# Altium PCB Smart-Switch-v1.1.PcbDoc (part 1 of 3)
Units mil, origin at the board's own origin, x right, y up, seen from the top; angles counter-clockwise.
Board outline 1456.69 x 1377.95 mil, 4 copper layers (Top Layer, Power Layer, Ground Layer, Bottom Layer), stack 39.334 mil thick; 77 components, 44 nets, 240 pads, 216 vias.
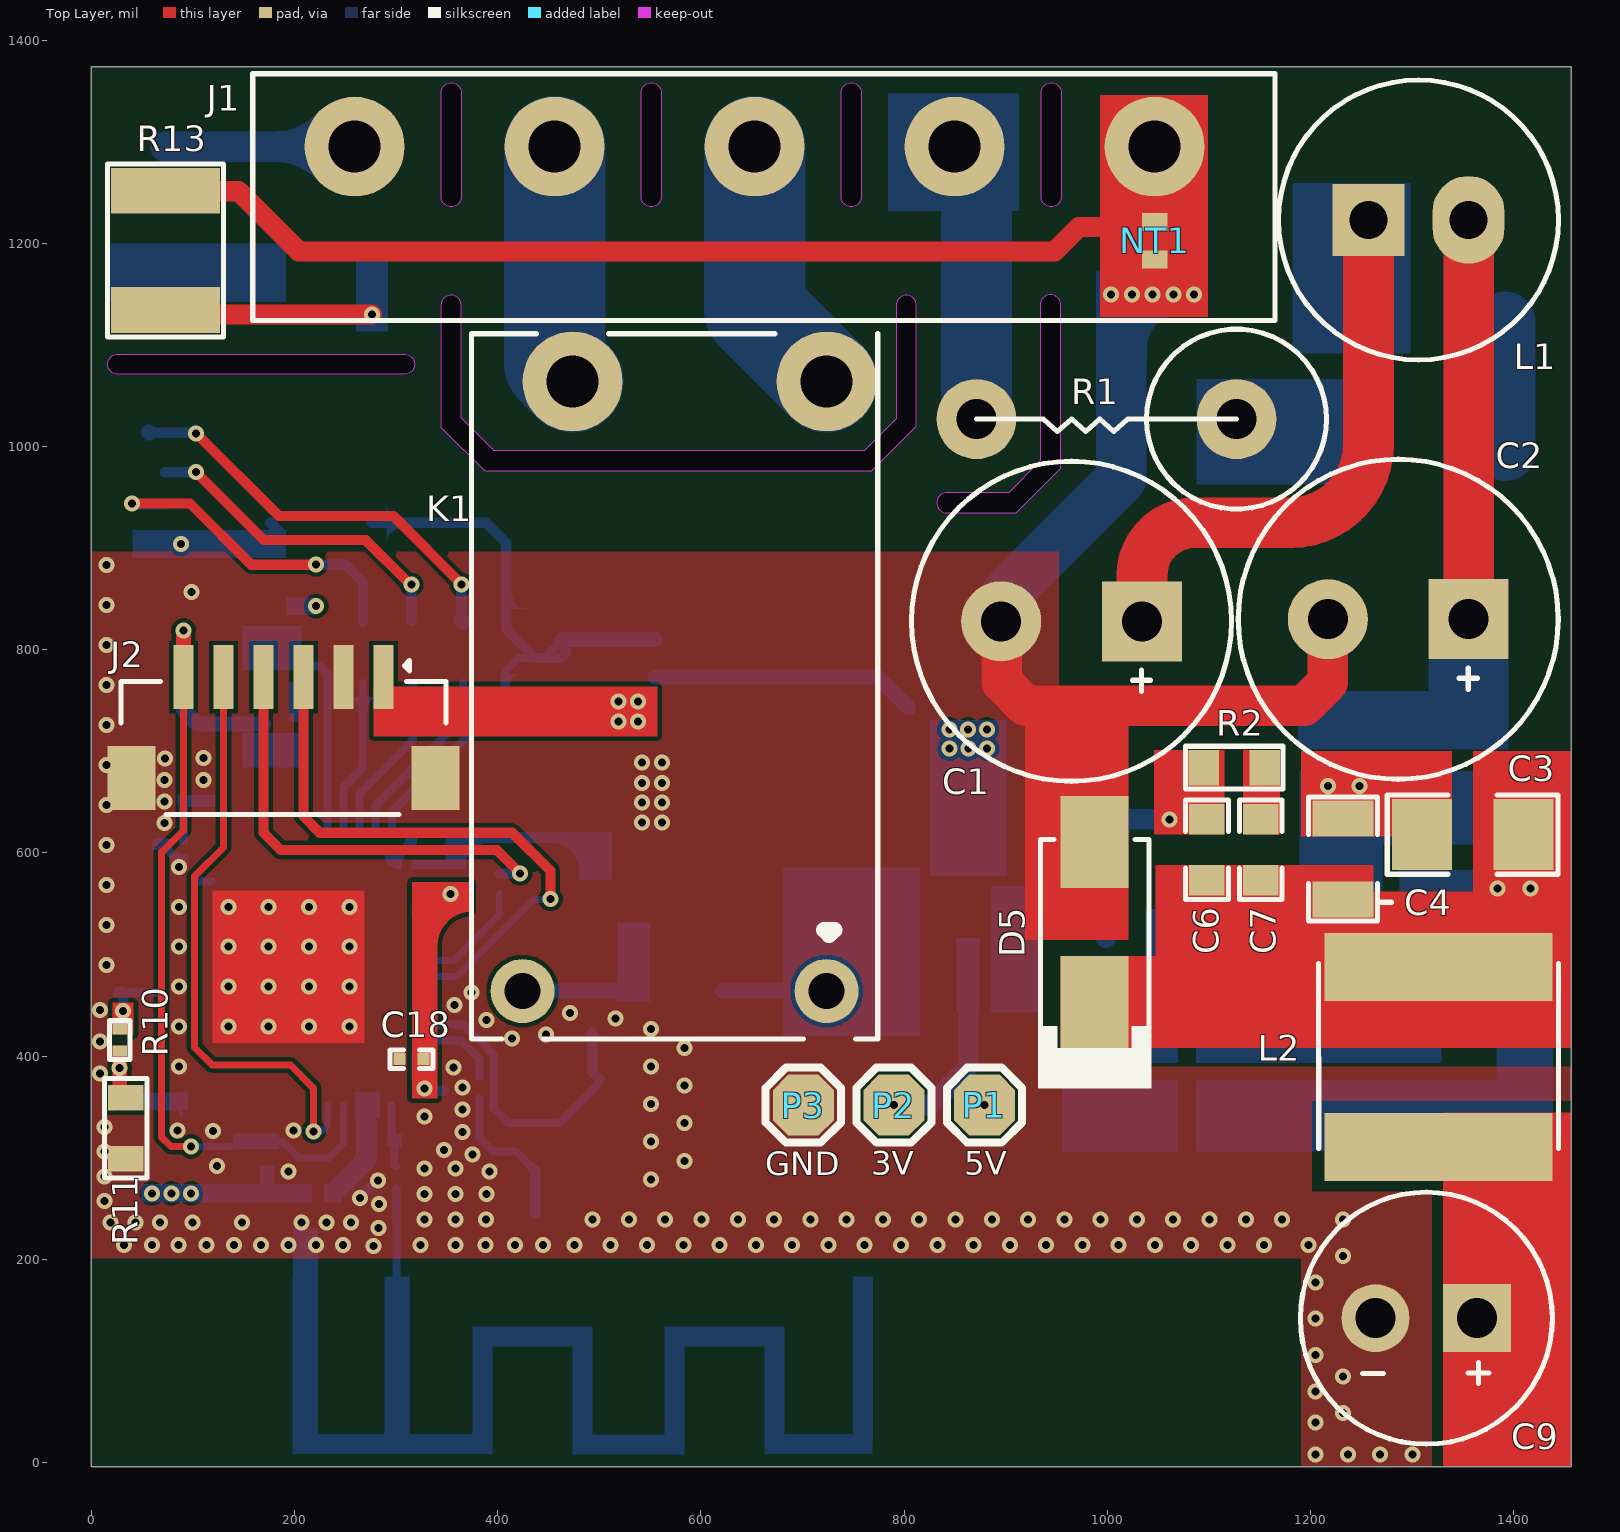
[diagram p0: Top Layer view]
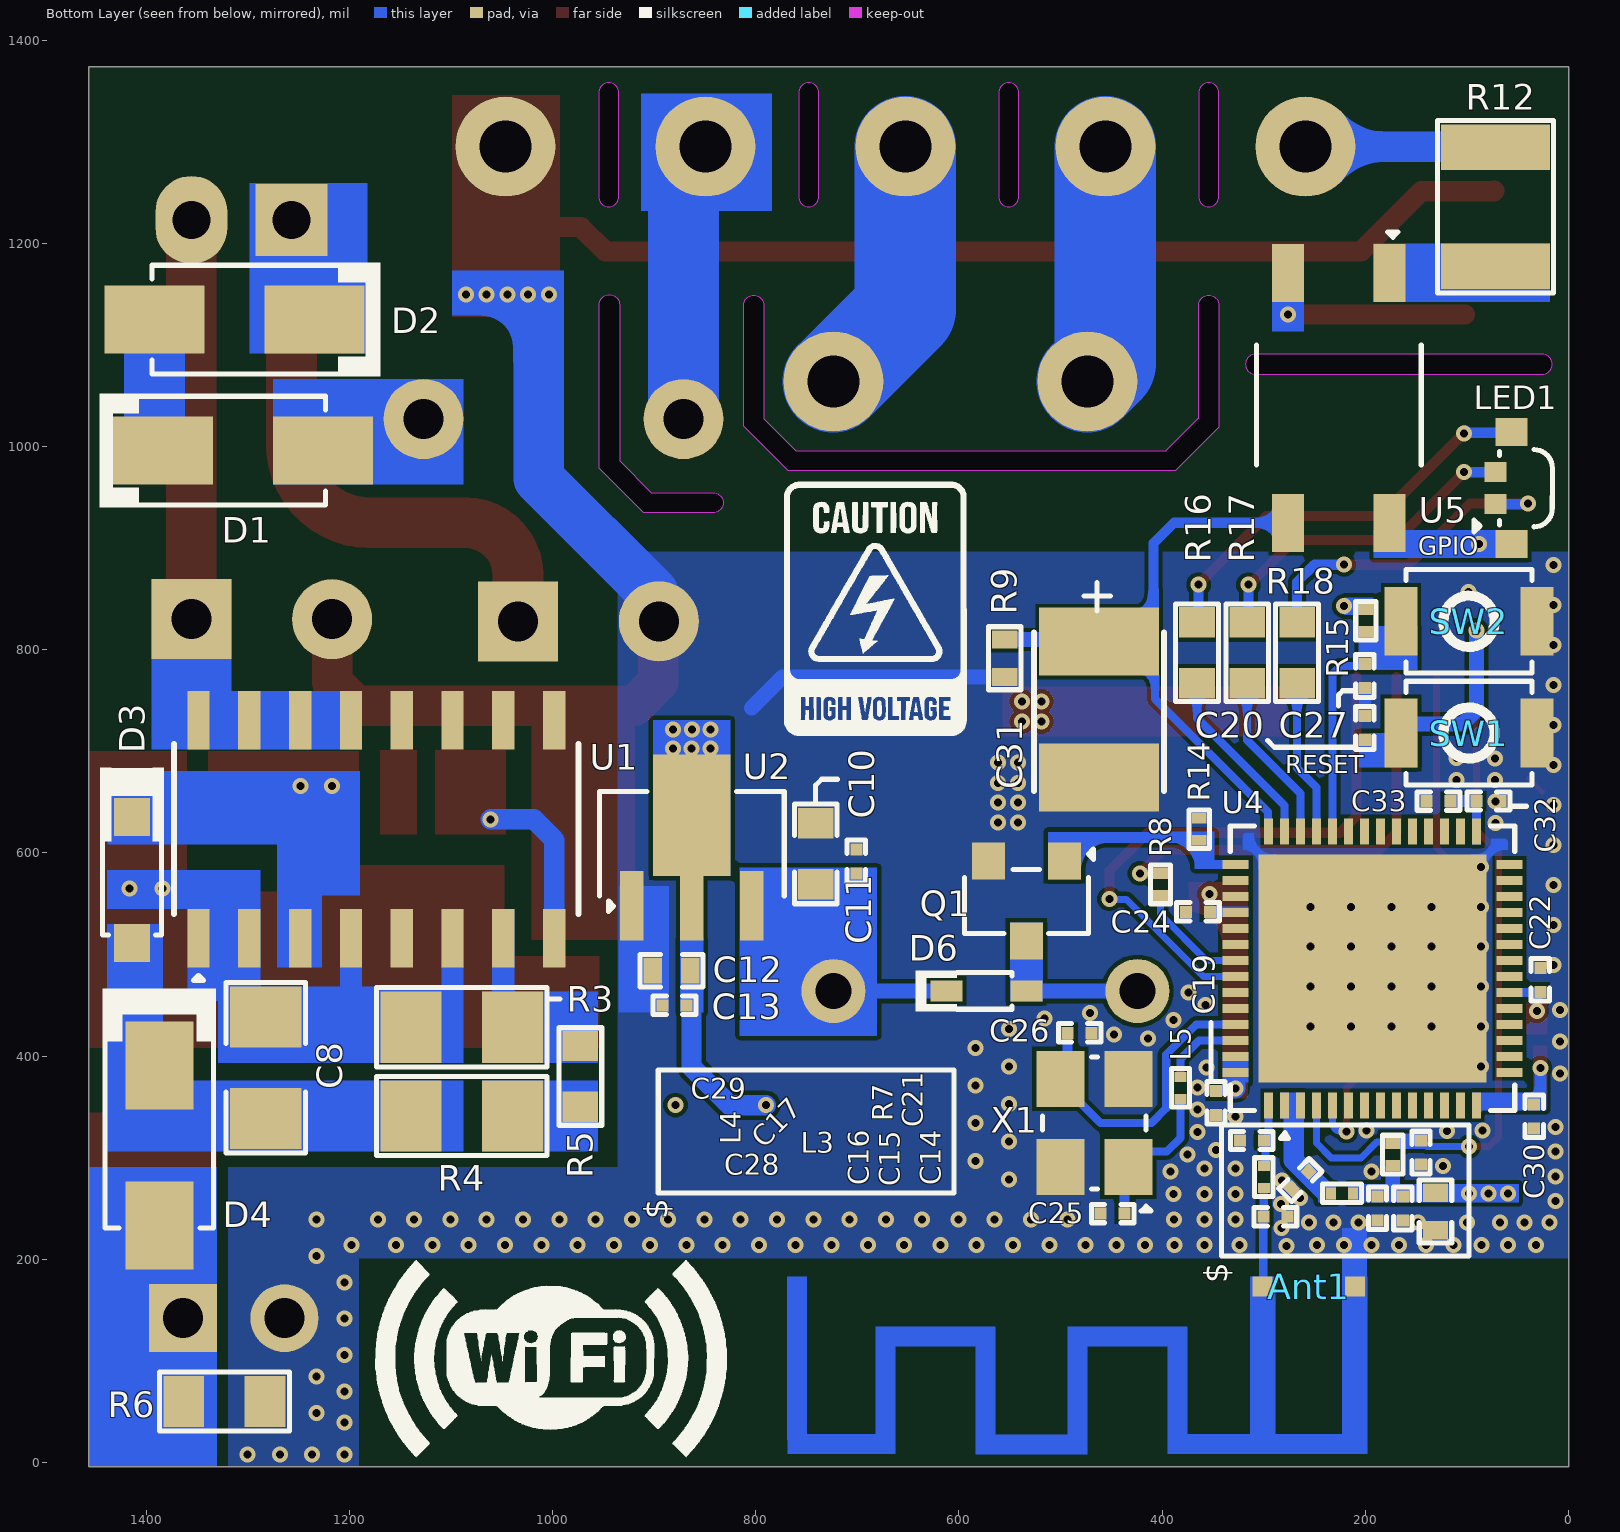
[diagram p1: Bottom Layer view, seen from below]
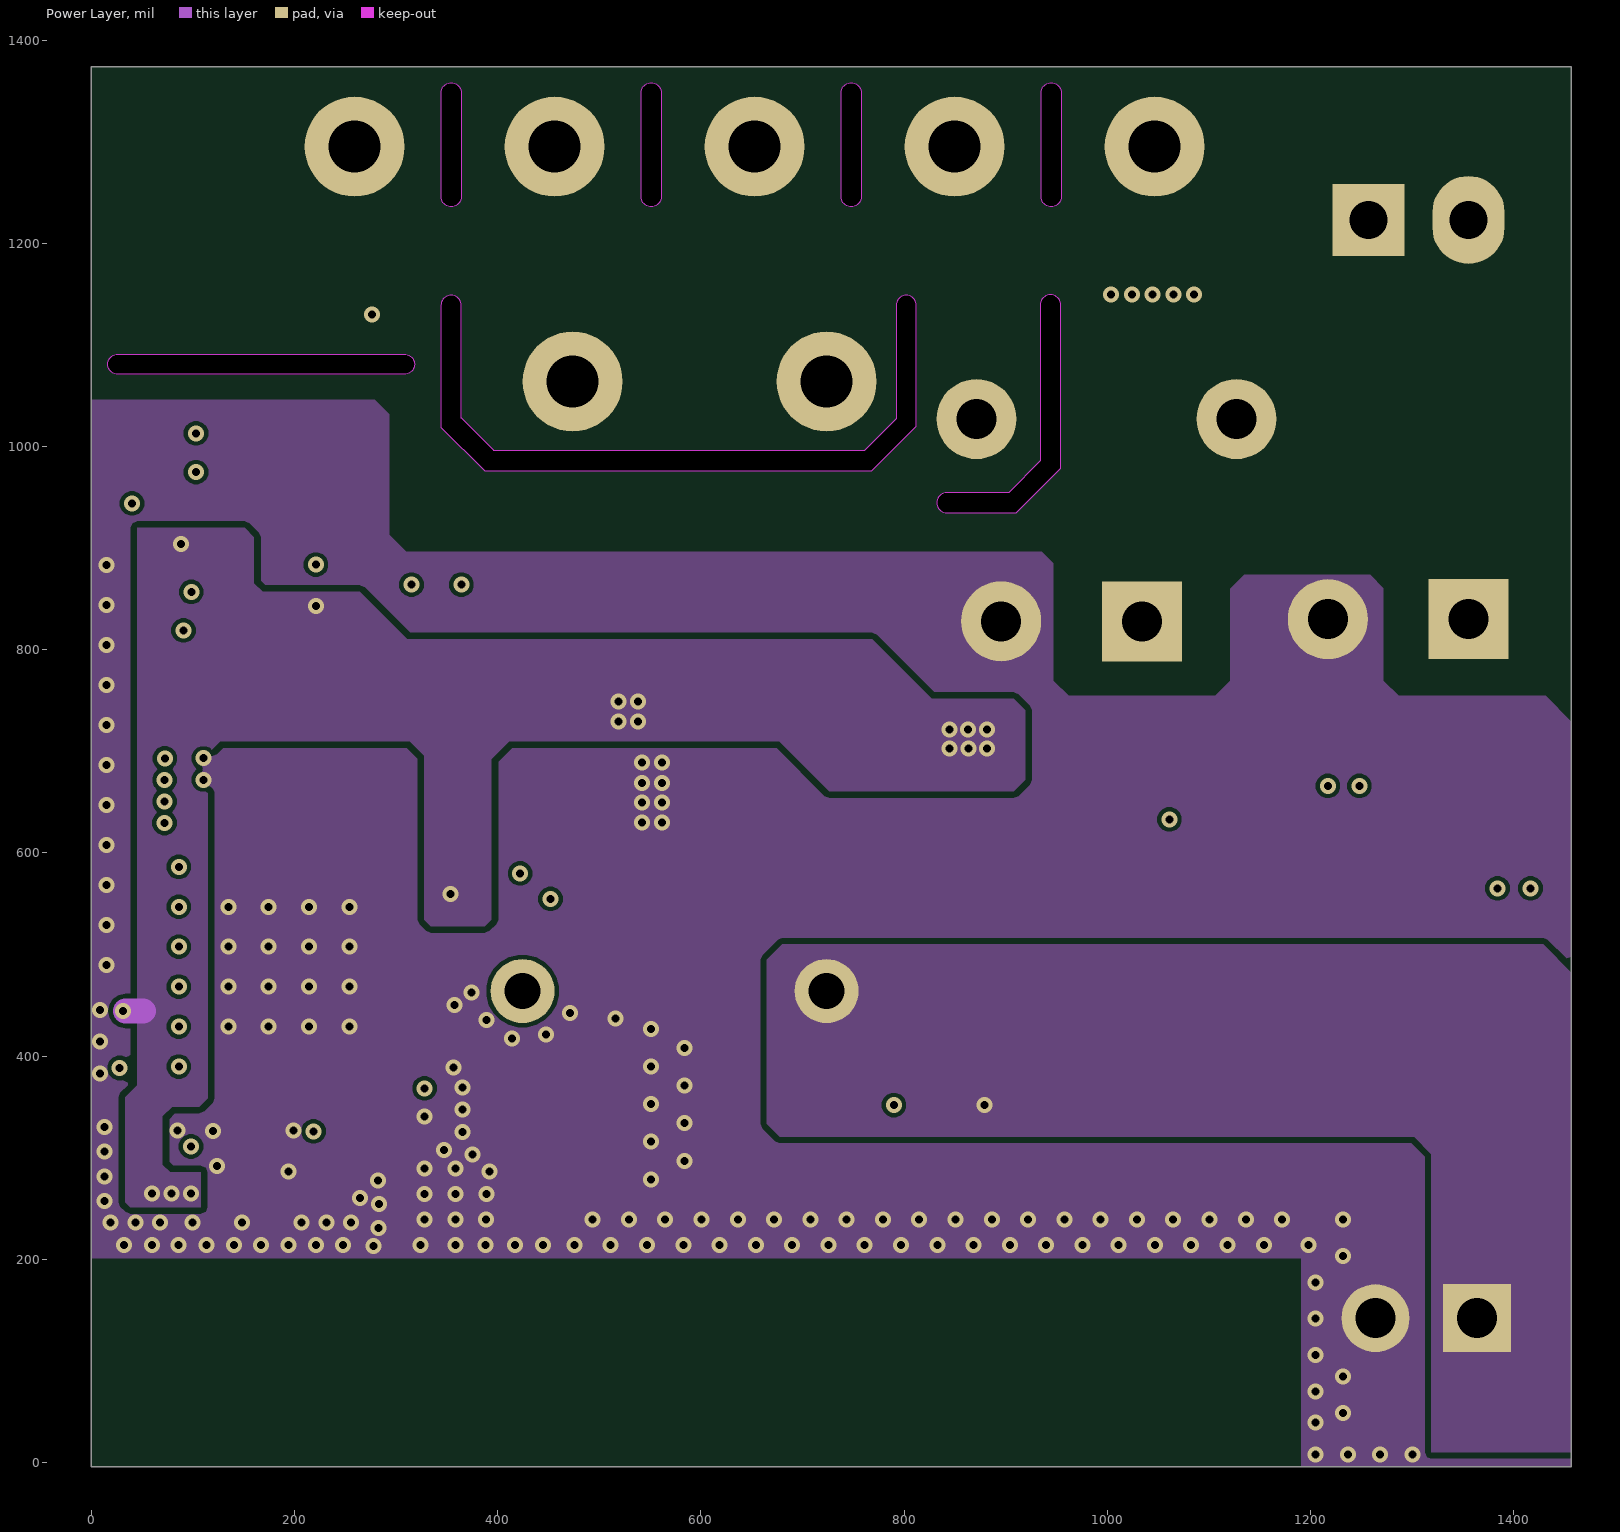
[diagram p2: Power Layer]
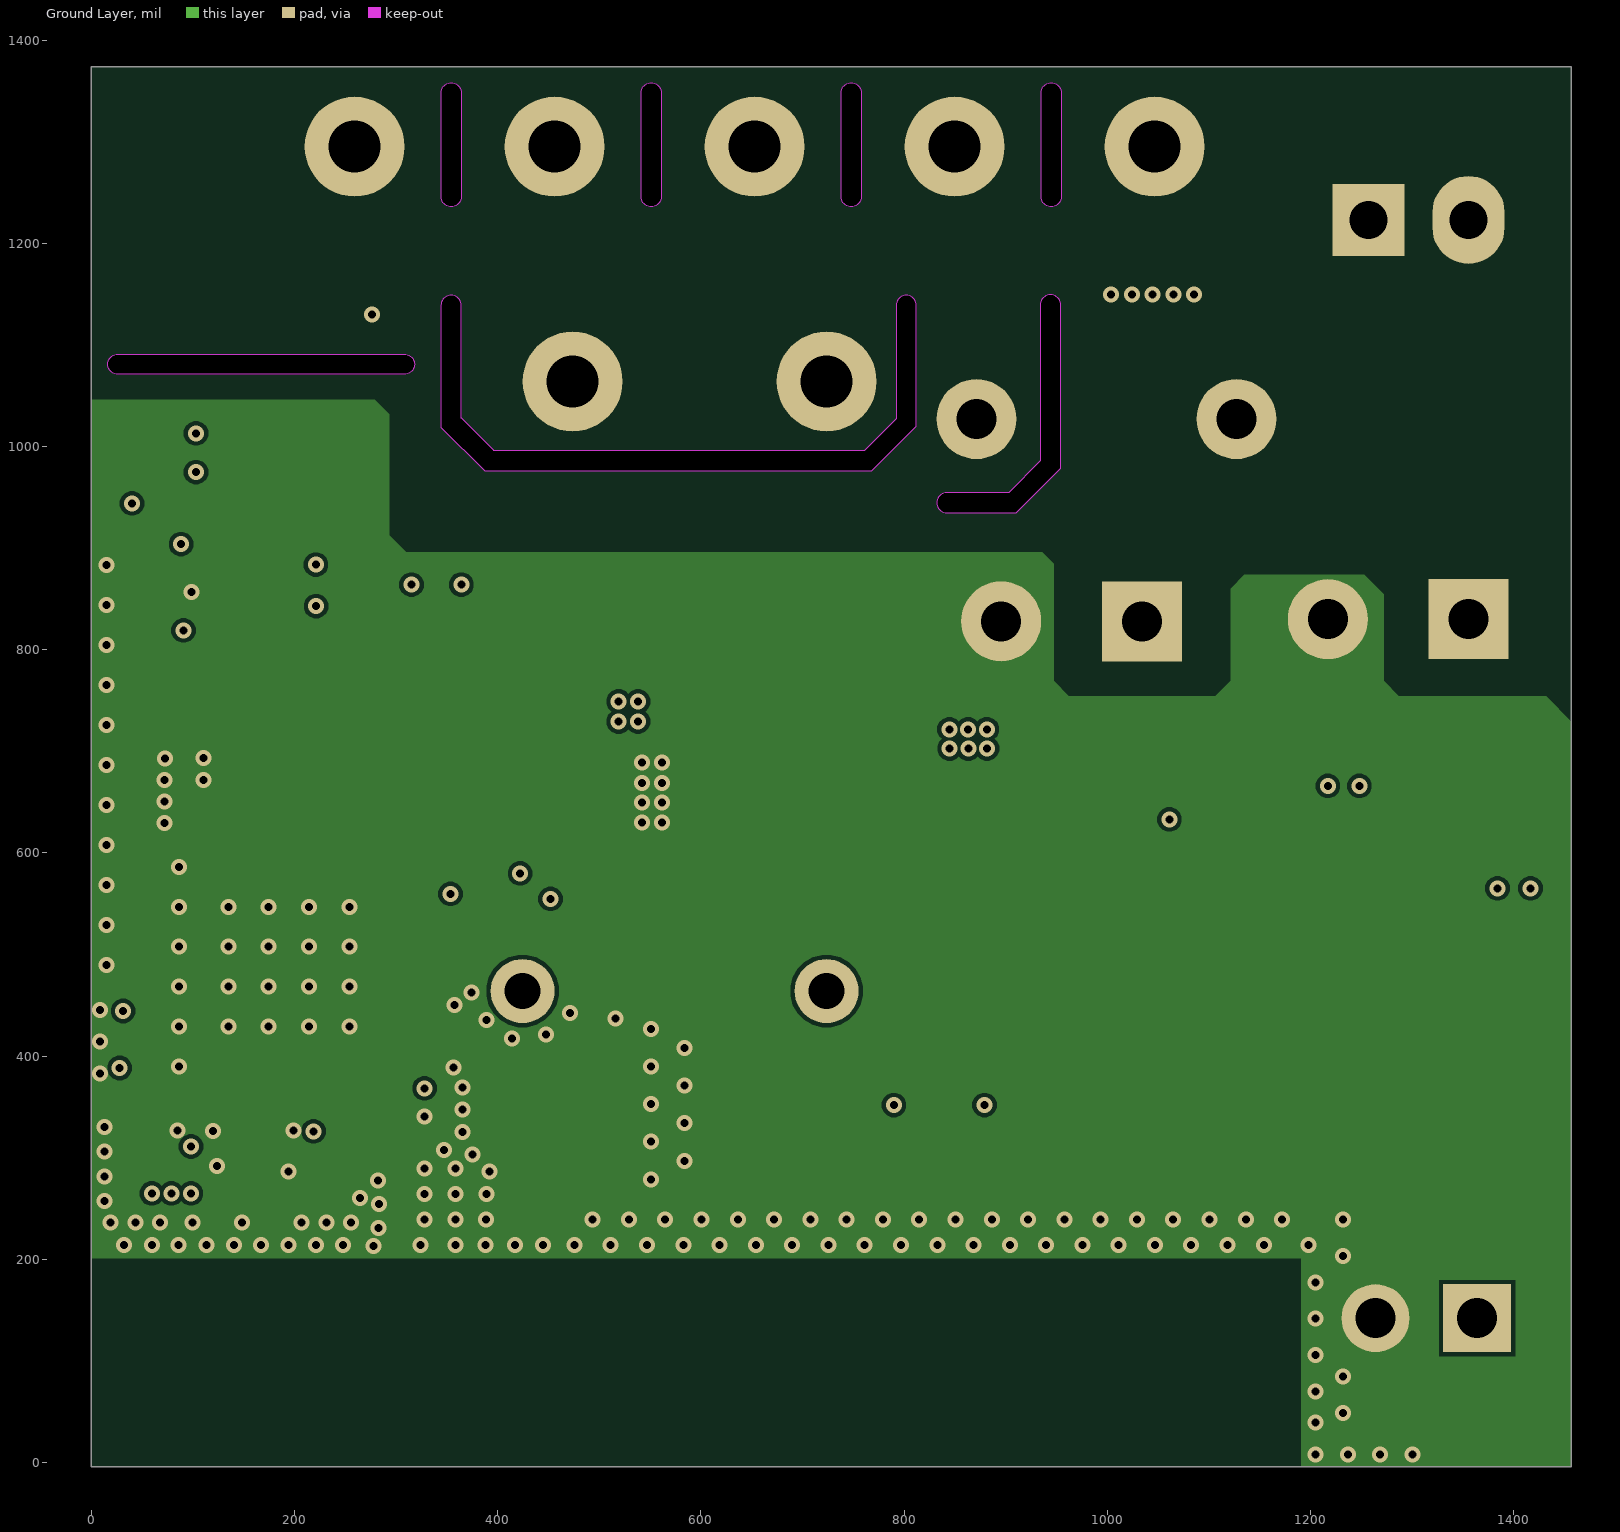
[diagram p3: Ground Layer]
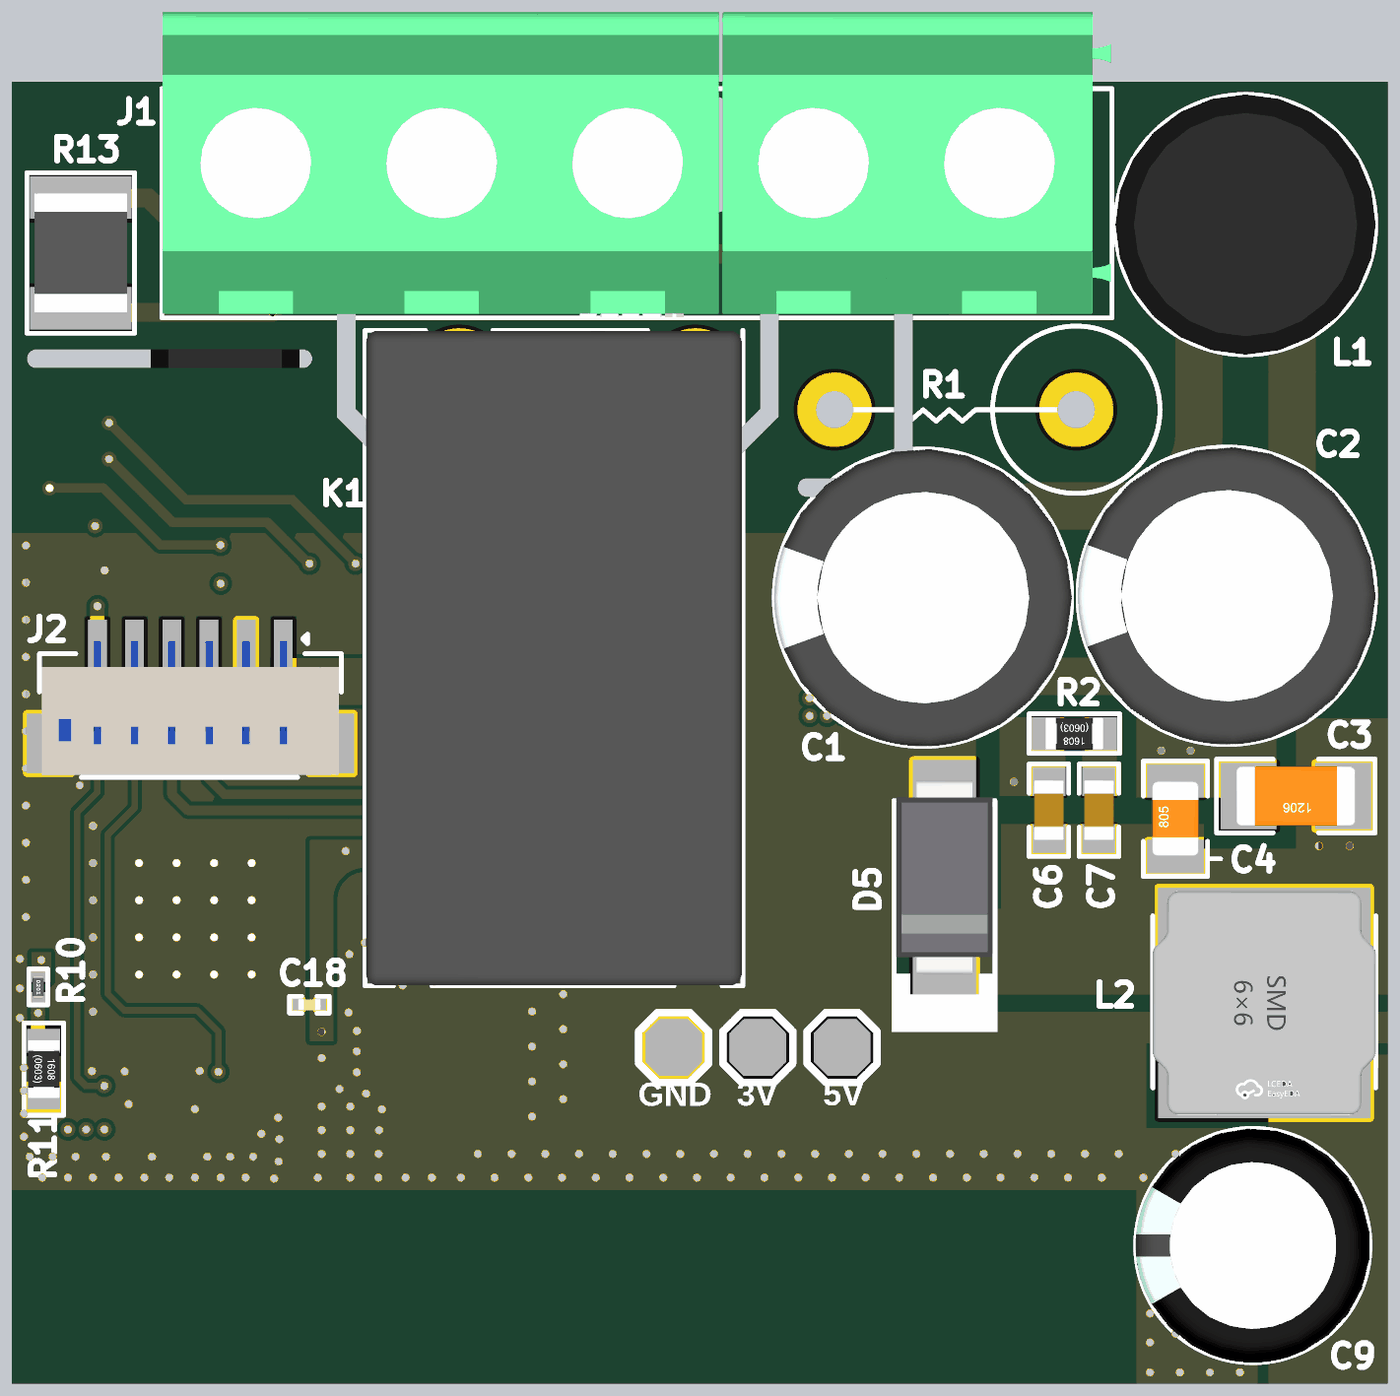
[diagram p5: 3D render of the assembled board from above, using the file's embedded part models]
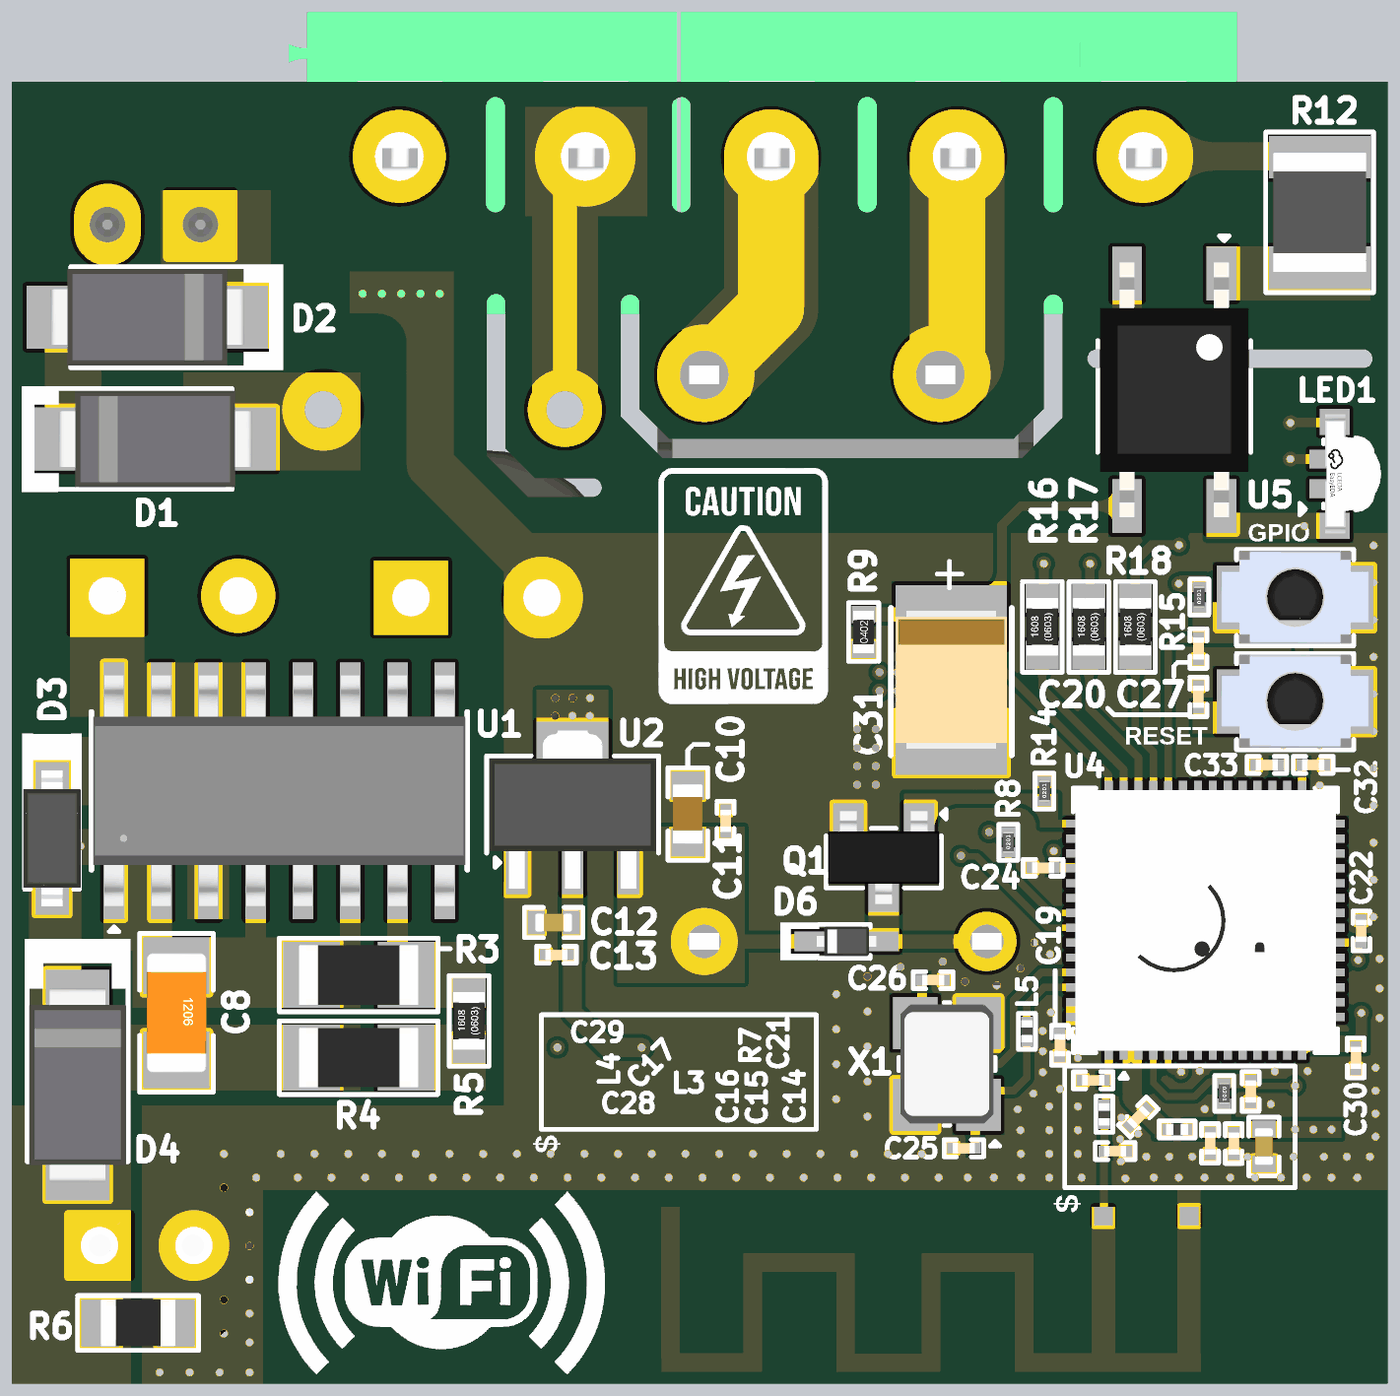
[diagram p6: 3D render of the assembled board from below, using the file's embedded part models]

## Layer stack, top to bottom
Top Solder: solder mask 0.4, Solder Resist, Dk 3.8
Top Layer: signal copper 1.378
Dielectric 2: prepreg 5.1, PP-006, Dk 4.6
Power Layer: signal copper 1.378
Dielectric 1: dielectric 23.622, FR-4, Dk 4.8
Ground Layer: signal copper 1.378
Dielectric 3: prepreg 5.1, PP-006, Dk 4.6
Bottom Layer: signal copper 1.378
Bottom Solder: solder mask 0.4, Solder Resist, Dk 3.8

## Board outline
0,-3.98 0,1373.98 1456.69,1373.98 1456.69,-3.98
cut-out: 832.06,944.63 ccw(c842.06,944.63) 842.06,934.63 910.2,934.63 954,978.43 954,1139.54 ccw(c944,1139.54) 944,1149.54 ccw(c944,1139.54) 934,1139.54 934,985.97 902.67,954.63 842.06,954.63 ccw(c842.06,944.63)
cut-out: 344.09,1018.83 386.92,976 768.24,976 812.04,1019.8 812.04,1138.9 ccw(c802.04,1138.9) 802.04,1148.9 ccw(c802.04,1138.9) 792.04,1138.9 792.04,1027.33 760.71,996 395.83,996 395.83,996.3 364.5,1027.63 364.09,1027.63 364.09,1138.9 ccw(c354.09,1138.9) 354.09,1148.9 ccw(c354.09,1138.9) 344.09,1138.9
cut-out: 26,1071 cw(c26,1081) 16,1081 cw(c26,1081) 26,1091 308.02,1091 cw(c308.02,1081) 318.02,1081 cw(c308.02,1081) 308.02,1071
cut-out: 354.15,1235.98 cw(c354.15,1245.98) 344.15,1245.98 344.15,1348 cw(c354.15,1348) 354.15,1358 cw(c354.15,1348) 364.15,1348 364.15,1245.98 cw(c354.15,1245.98)
cut-out: 551,1235.98 cw(c551,1245.98) 541,1245.98 541,1348 cw(c551,1348) 551,1358 cw(c551,1348) 561,1348 561,1245.98 cw(c551,1245.98)
cut-out: 747.85,1235.98 cw(c747.85,1245.98) 737.85,1245.98 737.85,1348 cw(c747.85,1348) 747.85,1358 cw(c747.85,1348) 757.85,1348 757.85,1245.98 cw(c747.85,1245.98)
cut-out: 944.7,1235.98 cw(c944.7,1245.98) 934.7,1245.98 934.7,1348 cw(c944.7,1348) 944.7,1358 cw(c944.7,1348) 954.7,1348 954.7,1245.98 cw(c944.7,1245.98)

## Design rules (kind name [scope] priority, off if disabled: settings)
Clearance [All] p1: gap=4 ignorepadtopadclearanceinfootprint=FALSE except(6: Poly-Poly)
ComponentClearance [All] p1: gap=0 collisioncheckmode=3 verticalgap=0 showdistances=FALSE
MinimumSolderMaskSliver [All] p1: minsoldermaskwidth=0
PolygonConnect [All] p1: connectstyle=Direct reliefconductorwidth=10 reliefentries=4 polygonreliefangle="45 Angle" airgapwidth=10
RoutingVias [All] p1: holewidth=7.87 width=15.75 viastyle="Through Hole" minholewidth=7.87 minwidth=15.75 maxholewidth=7.87 maxwidth=15.75
SilkToSilkClearance [All] p1: silktosilkclearance=0
SilkToSolderMaskClearance [IsPad] p1: minsilkscreentomaskgap=0 clearancetoexposedcopper=TRUE
SolderMaskExpansion [All] p1: expansion=4 istentingtop=FALSE
Width RF [InNetClass('RF')] p1: maxlimit=8.19 minlimit=5.18 preferedwidth=8.19 toplayer_minwidth=8.19 midlayer1_maxwidth=5.18 midlayer1_prefwidth=5.18 midlayer2_maxwidth=5.18 midlayer2_prefwidth=5.18 bottomlayer_minwidth=8.19 impedanceprofiledriven=TRUE impedanceprofileid={6EA76BCA-AD47-4699-BACC-62EAA46FC2F5} impedanceprofilevalue=50.000000 minimp=50.000000 maximp=50.000000 favimp=50.000000 // RF Impedance
Width [All] p2: maxlimit=100 minlimit=5 preferedwidth=10 minimp=50.000000 maximp=50.000000 favimp=50.000000
26 further rules are at their usual default settings.

## Classes and differential pairs
net class RF: NetAnt1_ANT# NetC29_2
component class U_Power-Sheet: 3 C1 C2 C3 C4 C6 C7 C8 C9 C10 C11 C12 C13 D1 D2 D3 D4 D5 J1 L1 L2 NT1 P1 P2 P3 R1 R2 R3 R4 R5 R6 SS U1 U2
component class U_Controller-Sheet: 2 Ant1 C14 C15 C16 C17 C18 C19 C20 C21 C22 C24 C25 C26 C27 C28 C29 C30 C31 C32 C33 D6 J2 K1 L3 L4 L5 LED1 Q1 R7 R8 R9 R10 R11 R12 R13 R14 R15 R16 R17 R18 SW1 SW2 U4 U5 X1

## Components (designator, comment, footprint, x,y, rotation, side; value= is the part's Value field where it differs from the comment)
Ant1 "ESP Patch Anttena" "ESP Patch Antenna" 198,221 r0 bottom locked net-tie
C1 "6.8uF" 6.8UF400V87EC0241 964.71,828 r180 top
C2 "6.8uF" 6.8UF400V87EC0241 1286.29,830 r180 top
C3 "4.7uF" Cap-1206#1 1359.43,618 r180 top
C4 "100pF" Cap-0805 1232,594 r90 top
C6 "330pF" Cap-0603 1098,603 r90 top
C7 "22nF" Cap-0603 1151,603 r90 top
C8 "220nF" Cap-1206#2 1282.33,388.47 r270 bottom
C9 "680uF" SHW680UF10V6.3X11 1313.9,142.05 r180 top
C10 "10uF" Cap-0603 741,599 r270 bottom
C11 "0.1uf" CAP-0201 701,591.59 r270 bottom value=100nF
C12 "10uF" Cap-0402 883,484 r180 bottom
C13 "0.1uf" CAP-0201 880,450 r180 bottom value=100nF
C14 "10uF" Cap-0402 131,247 r90 bottom
C15 "1uF" CAP-0201 163.05,250.02 r90 bottom
C16 "0.1uf" CAP-0201 188.05,250.21 r90 bottom value=100nF
C17 "0.1uf" CAP-0201 264,278 r135 bottom value=100nF
C18 "1uF" CAP-0201 315.05,397 r0 top
C19 "0.1uF" CAP-0201 347.04,354.09 r90 bottom value=100nF
C20 "0.1uf" CAP-0201 200.45,723 r270 bottom value=100nF
C21 "1uF" CAP-0201 145.21,305.09 r90 bottom
C22 "0.1uf" CAP-0201 27.84,475.16 r270 bottom value=100nF
C24 "0.1uf" CAP-0201 364.82,542.03 r180 bottom value=100nF
C25 "22PF" CAP-0201 448.72,245 r180 bottom value=22pF
C26 "22PF" CAP-0201 481.23,423 r0 bottom value=22pF
C27 "0.1uf" CAP-0201 200.45,774.14 r90 bottom value=100nF
C28 "2.7pF" CAP-0201 288.5,242 r0 bottom
C29 "4.7pF" CAP-0201 311.81,317 r180 bottom
C30 "0.1uF" CAP-0201 33.84,340.72 r90 bottom value=100nF
C31 "33uF" Case-B 462,740.94 r270 bottom
C32 "0.1uF" CAP-0201 78.8,651.04 r0 bottom value=100nF
C33 "1uF" CAP-0201 128,651 r180 bottom
D1 "MRA4007T3G" SMA#1 1304.84,996 r180 bottom
D2 "MRA4007T3G" SMA#1 1313.26,1125 r0 bottom
D3 "BAT46ZFILM" SOD-123 1414,573.15 r90 bottom value=10pF
D4 "STTH1L06A" SMA#2 1387,312 r270 bottom
D5 "STTH1L06A" SMA#3 987.43,531.97 r90 top
D6 "1N4148WT" SOD-523F 573,464.15 r0 bottom
J1 "WJ127-5.0-5P" WJ127-5.0-5P 652.78,1295.19 r180 top
J2 "Voltlink Target" "Voltlink Target" 189.06,723.31 r180 top
K1 "HF32FA-G/005-HSL1" HF32FA-G/005-HSL1 574,764 r90 top locked
L1 "1mH" SPK0608-102MB 1306.21,1223 r0 top
L2 "220uH" YNR6045-221M 1326,399 r270 top
L3 "2nH" IND-0201 223,265 r0 bottom
L4 "1.6nH" IND-0201 300,281 r90 bottom
L5 "24nH" IND-0201 382,368.83 r270 bottom
LED1 "MHS110FRGBCT" MHS110FRGBCT 64,959 r270 bottom
NT1 "Net Tie_SMD" "Net Tie Pad" 1046.5,1202.5 r270 top net-tie
P1 "TEST POINT" Test-point 879,351.74 r270 top
P2 "TEST POINT" Test-point 789.84,351.74 r270 top
P3 "TEST POINT" Test-point 700.68,351.74 r270 top
Q1 "DMN13H750S-7" SOT-23 533.63,552.77 r0 bottom
R1 "10R" "MO2WS VERTICAL TYPE" 1127,1027 r180 top locked
R2 "220K" Res-0603#1 1125,684 r0 top
R3 "22K" Res-1206 1089.43,428.47 r180 bottom
R4 "22K" Res-1206 1089.43,341 r0 bottom
R5 "56K" Res-0603#1 972.6,379.96 r270 bottom
R6 "5.6K" RES-0805 1323,60 r0 bottom value=5.6kR
R7 "10K" Res-0201 173,303.09 r270 bottom
R8 "499R" Res-0201 401.64,569 r90 bottom
R9 "1K" Res-0402 554.89,791.64 r90 bottom
R10 "10K" Res-0201 28,415.83 r270 top
R11 "10k" Res-0603#2 33.84,328.91 r90 top value=10kR
R12 "200K" Res_1210 72,1236 r270 bottom
R13 "200K" Res_1210 73,1193 r270 top
R14 "10K" Res-0201 363.43,623.21 r90 bottom
R15 "10K" Res-0201 199.45,828.63 r90 bottom
R16 "240R" Res-0603#1 365.7,797.02 r270 bottom
R17 "100R" RES-0603 316.35,797.02 r270 bottom
R18 "100R" RES-0603 267.25,797.02 r270 bottom
SW1 "B3U-1000P" B3U-1000P 98,718 r0 bottom
SW2 "B3U-1000P" B3U-1000P 98,828 r0 bottom
U1 "VIPER319LDTR" SOP-16 1173.43,623.47 r90 bottom
U2 "LD1117AG-33-AB3-A-R" SOT-89-3 862.95,592.59 r180 bottom locked
U4 "ESP32-S3FH4R2" "QFNWB-56 (7×7)" 193,486.36 r90 bottom
U5 "PS2705-1-F3-A" SOP-4_2.54 226,1048 r270 bottom
X1 "40MHz" X322540MPB4SI_ 466.72,334.25 r90 bottom value=40MHZ

## Footprints (in the part's own frame and the unit in brackets; to place one, negate y for a bottom-side part, rotate by r counter-clockwise, add the part's x,y. Pads: shape width x height; smd on the part's side, far side on the other; paste and mask are expansions set on the pad)
6.8UF400V87EC0241 [mm]
  rect 2x2 hole 1: 1(-1.76,0)
  round 2 hole 1: 2(1.76,0)
  silkscreen extent -4,-4 4,4, body extent -4.01,-4 4.01,4, height 11.5
B3U-1000P [mm] "SWITCH TACTILE SPST-NO 0.05A 12V"
  rect 0.82x1.72 smd: 1(-1.7,0) 2(1.7,0)
  silkscreen extent -1.57,-1.3 1.57,1.3, body extent -2,-1.26 2,1.24, height 1.6
CAP-0201 [mm]
  rect 0.3x0.3 smd mask+0.055: 1(-0.3,0) 2(0.3,0)
  silkscreen extent -0.53,-0.23 0.53,0.23, body extent -0.3,-0.15 0.3,0.15, height 0.28
Cap-0402 [mil]
  rect 18x25 smd mask+2.36: 1(-18.5,0) 2(18.5,0)
  silkscreen extent -31,-16 31,16, body extent -20,-10 20,10, height 19
Cap-0603 [mil]
  rect 30x35 smd mask+2.36: 1(-30,0) 2(30,0)
  silkscreen extent -49,-21 49,21, body extent -32,-16 31,16, height 34
Cap-0805 [mil] "SMD 0805"
  rect 35.43x60 smd mask+2.76: 1(-40,0) 2(40,0)
  silkscreen extent -61,-34 61,34, body extent -39,-25 39,25, height 30
Cap-1206#1 [mil] "SMD 1206"
  rect 59.06x70 smd: 1(-50,0) 2(50,0)
  silkscreen extent -84,-39 84,39, body extent -63,-31 63,32, height 39
Cap-1206#2 [mil] "SMD 1206"
  rect 60x70 smd: 1(-50,0) 2(50,0)
  silkscreen extent -84,-39 84,39, body extent -63,-31 63,32, height 39
Case-B [mm]
  rect 1.7x3 smd paste+0: 1(-1.7,0) 2(1.7,0)
  silkscreen extent -1.93,-1.63 2.03,1.63, body extent -1.85,-1.5 1.85,1.5, height 2.16
"ESP Patch Antenna" [mm]
  rect 0.5x0.5 smd: ANT#(2.616,1.213) GND(0.305,1.213)
  Top Layer region: 14.498,5.405 14.498,4.905 11.798,4.905 11.798,5.405
  Top Layer region: 12.3,2.21 11.8,2.21 11.8,5.055 12.3,5.055
  Top Layer region: 9.648,2.209 9.648,2.709 11.959,2.709 11.959,2.209
  Top Layer region: 9.3,5.029 9.8,5.029 9.8,2.21 9.3,2.21
  Top Layer region: 9.796,5.409 9.796,4.909 6.996,4.909 6.996,5.409
  Top Layer region: 7.5,2.21 7,2.21 7,5.029 7.5,5.029
  Top Layer region: 4.873,2.209 4.873,2.709 7.133,2.709 7.133,2.209
  Top Layer region: 4.5,5.029 5,5.029 5,2.21 4.5,2.21
  Top Layer region: 2.3,5.029 2.93,5.029 2.93,0.963 2.3,0.963
  Top Layer region: -0.002,4.905 -0.002,5.405 4.998,5.405 4.998,4.905
  Top Layer region: 0,5.029 0.63,5.029 0.63,0.963 0,0.963
  Top Layer region: 14.005,5.055 14.505,5.055 14.505,0.963 14.005,0.963
HF32FA-G/005-HSL1 [mm]
  round 1.6 hole 0.9: 1(-7.62,-3.8) 2(-7.62,3.8)
  round 2.5 hole 1.3: 3(7.62,2.55) 4(7.62,-3.8)
  silkscreen extent -8.81,-5.08 8.81,5.08, body extent -8.8,-5.05 8.8,5.06, height 12.6
IND-0201 [mm]
  rect 0.25x0.3 smd mask+0.055: 1(-0.275,0) 2(0.275,0)
  silkscreen extent -0.48,-0.23 0.48,0.23, body extent -0.3,-0.15 0.3,0.15, height 0.15
MHS110FRGBCT [mm]
  rect 0.7x0.8 smd: 1(1.4,0.2) 4(-1.4,0.2)
  rect 0.5x0.55 smd: 2(0.4,-0.2) 3(-0.4,-0.2)
  silkscreen extent -0.91,-0.1 0.91,-0.1, body extent -1.6,-0.05 1.6,1.45, height 1.01
"MO2WS VERTICAL TYPE" [mm]
  round 2 hole 1: 1(0,0) 2(6.5,0)
  silkscreen extent -2.25,-2.25 6.5,2.25, body extent -2.26,-2.29 7.42,2.26, height 15.22
"Net Tie Pad" [mil]
  rect 18x25 smd mask-10: 1(-18.5,0) 2(18.5,0)
  Top Layer region: -15.05,-53.82 18.5,-53.82 18.5,52.68 -15.05,52.68
"QFNWB-56 (7×7)" [mm]
  rect 0.65x0.22 smd: 1(-3.425,2.6) 2(-3.425,2.2) 3(-3.425,1.8) 4(-3.425,1.4) 5(-3.425,1) 6(-3.425,0.6) 7(-3.425,0.2) 8(-3.425,-0.2) 9(-3.425,-0.6) 10(-3.425,-1) 11(-3.425,-1.4) 12(-3.425,-1.8) 13(-3.425,-2.2) 14(-3.425,-2.6) 29(3.425,-2.6) 30(3.425,-2.2) 31(3.425,-1.8) 32(3.425,-1.4) 33(3.425,-1) 34(3.425,-0.6) 35(3.425,-0.2) 36(3.425,0.2) 37(3.425,0.6) 38(3.425,1) 39(3.425,1.4) 40(3.425,1.8) 41(3.425,2.2) 42(3.425,2.6)
  rect 0.22x0.65 smd: 15(-2.6,-3.425) 16(-2.2,-3.425) 17(-1.8,-3.425) 18(-1.4,-3.425) 19(-1,-3.425) 20(-0.6,-3.425) 21(-0.2,-3.425) 22(0.2,-3.425) 23(0.6,-3.425) 24(1,-3.425) 25(1.4,-3.425) 26(1.8,-3.425) 27(2.2,-3.425) 28(2.6,-3.425) 43(2.6,3.425) 44(2.2,3.425) 45(1.8,3.425) 46(1.4,3.425) 47(1,3.425) 48(0.6,3.425) 49(0.2,3.425) 50(-0.2,3.425) 51(-0.6,3.425) 52(-1,3.425) 53(-1.4,3.425) 54(-1.8,3.425) 55(-2.2,3.425) 56(-2.6,3.425)
  rect 5.7x5.7 smd: 57(0,0)
  silkscreen extent -3.56,-3.56 3.56,3.56, body extent -3.5,-3.51 3.5,3.49, height 0.92
Res-0201 [mm]
  rect 0.27x0.37 smd mask+0.055: 1(-0.275,0) 2(0.275,0)
  silkscreen extent -0.48,-0.25 0.48,0.25, body extent -0.3,-0.15 0.3,0.15, height 0.29
Res-0402 [mil]
  rect 18x25 smd mask+2.17: 1(-18.5,0) 2(18.5,0)
  silkscreen extent -32,-17 32,16, body extent -23,-11 23,11, height 16
Res-0603#1 [mil]
  rect 30x35 smd: 1(-30,0) 2(30,0)
  silkscreen extent -48,-21 48,21, body extent -31,-17 31,17, height 18
Res-0603#2 [mil]
  rect 25x35 smd: 1(-30,0) 2(30,0)
  silkscreen extent -49,-21 49,21, body extent -31,-17 31,17, height 18
RES-0603 [mil]
  rect 30x35 smd: 1(-30,0) 2(30,0)
  silkscreen extent -48,-21 48,21, body extent -31,-17 31,17, height 18
RES-0805 [mil] "SMD 0805"
  rect 40x50 smd: 1(-40,0) 2(40,0)
  silkscreen extent -64,-29 64,29, body extent -39,-25 39,24, height 24
Res-1206 [mil]
  rect 60x70 smd: 1(-50,0) 2(50,0)
  silkscreen extent -84,-39 84,39, body extent -63,-31 63,31, height 24
Res_1210 [mm]
  rect 1.14x2.72 smd: 1(-1.49,0) 2(1.49,0)
  silkscreen extent -2.16,-1.45 2.16,1.45, body extent -1.6,-1.25 1.6,1.25, height 0.7
SHW680UF10V6.3X11 [mm]
  rect 1.7x1.7 hole 1: 1(-1.27,0)
  round 1.7 hole 1: 2(1.27,0)
  silkscreen extent -3.15,-3.15 3.15,3.15, body extent -3.16,-3.15 3.16,3.15, height 11.21
SMA#1 [mm]
  rect 2.5x1.7 smd: 1(-2,0) 2(2,0)
  silkscreen extent -3.59,-1.42 2.06,1.42, body extent -2.6,-1.3 2.6,1.3, height 2.4
SMA#2 [mm]
  rect 2.2x1.7 smd: 1(-2,0) 2(2,0)
  silkscreen extent -3.93,-1.42 2.06,1.42, body extent -2.6,-1.3 2.6,1.3, height 2.4
SMA#3 [mm]
  rect 2.3x1.7 smd: 1(-2,0) 2(2,0)
  silkscreen extent -4.16,-1.42 2.06,1.42, body extent -2.6,-1.3 2.6,1.3, height 2.4
SOD-123 [mm]
  rect 0.95x0.9 smd: 1(-1.575,0) 2(1.575,0)
  silkscreen extent -1.37,-0.8 2.82,0.8, body extent -1.82,-0.77 1.83,0.78, height 1.5
SOD-523F [mm]
  rect 0.8x0.52 smd: 1(-1,0) 2(1,0)
  silkscreen extent -0.64,-0.51 1.78,0.51, body extent -0.8,-0.4 0.8,0.4, height 0.7
SOP-4_2.54 [mm]
  rect 1.45x0.8 smd: 1(-3.125,1.27) 2(-3.125,-1.27) 3(3.125,-1.27) 4(3.125,1.27)
  silkscreen extent -4.14,-2.06 1.68,2.06, body extent -3.43,-2 3.43,2, height 2.02
SOP-16 [mil]
  rect 57.55x22 smd: 1(-107.27,175) 2(-107.27,125) 3(-107.27,75) 4(-107.27,25) 5(-107.27,-25) 6(-107.27,-75) 7(-107.27,-125) 8(-107.27,-175) 9(107.27,-175) 10(107.27,-125) 11(107.27,-75) 12(107.27,-25) 13(107.27,25) 14(107.27,75) 15(107.27,125) 16(107.27,175)
  silkscreen extent -149,-199 84,199, body extent -122,-197 122,197, height 69
SOT-23 [mm] "TRANS NPN 40V 0.6A SOT23"
  rect 0.82x0.92 smd: 1(-0.95,-1) 2(0.95,-1) 3(0,1)
  silkscreen extent -1.68,-1.3 1.55,0.81, body extent -1.5,-1.25 1.5,1.25, height 1.05
SOT-89-3 [mm]
  rect 0.58x1.73 smd: 1(-1.5,-1.132) 2(0,-1.132) 3(1.5,-1.132)
  rect 1.933x3.03 smd: 2(0,1.132)
  silkscreen extent -2.31,-1.27 2.31,1.73, body extent -2.25,-1.84 2.25,2.41, height 1.54
SPK0608-102MB [mm]
  rect 1.8x1.8 hole 0.95: 1(-1.25,0)
  oval 1.8x2.2 hole 0.95: 2(1.25,0)
  silkscreen extent -3.5,-3.5 3.5,3.5, body extent -3.5,-3.49 3.5,3.49, height 11
Test-point [mil]
  oct 60x60 smd: 1(0,0)
  silkscreen extent -37,-37 37,37
"Voltlink Target" [mm]
  rect 0.5x1.6 smd: 1(-2.5,-1.262) 2(-1.5,-1.262) 3(-0.5,-1.262) 4(0.5,-1.262) 5(1.5,-1.262) 6(2.5,-1.262)
  rect 1.2x1.6 smd: MP1(-3.8,1.262) MP2(3.8,1.262)
  silkscreen extent -4.06,-1.68 4.06,2.17, body extent -4,-1.49 4,2.11, height 4.25
WJ127-5.0-5P [mm]
  round 2.5 hole 1.3: 1(-10,0) 2(-5,0) 3(0,0) 4(5,0) 5(10,0)
  silkscreen extent -13,-1.82 12.55,4.34, body extent -12.98,-3.87 12.52,4.33, height 10.1
X322540MPB4SI_ [mm]
  rect 1.4x1.2 smd: 1(-1.1,-0.85) 2(1.1,-0.85) 3(1.1,0.85) 4(-1.1,0.85)
  silkscreen extent -1.65,-1.3 1.65,1.3, body extent -1.6,-1.25 1.6,1.25, height 0.8
YNR6045-221M [mm]
  rect 1.7x5.7 smd: 1(-2.25,0) 2(2.25,0)
  silkscreen extent -2.34,-3 2.29,3, body extent -3.01,-3 3.01,3, height 4.52

## Part data
Ant1: "ESP32 MIFA PCB ANTENNA", Item Type=Antenna, Manufacturer Part Number="ESP Patch Anttena"
C1 C2: library part 6.8UF400V87EC0241, "6.8uF 400V ±20% 118mA@100kHz Plugin,D8xL9mm Aluminum Electrolytic Capacitors - Leaded ROHS", LCSC Part Number=C2803208, Manufacturer=KNSCHA, Package=Plugin,D8xL9mm, ComponentLink1Description=LCSC, ComponentLink1URL=https://www.lcsc.com/product-detail/Aluminum-Electrolytic-Capacitors-Leaded_KNSCHA-6-8UF400V87EC0241_C2803208.html, Item Type="Electrolytic Capacitor", Manufacturer Part Number=6.8UF400V87EC0241
C3: library part CL31A475KB9LNNC, "CAP CER 4.7UF 50V X5R 1206", Case Code (Imperial)=1206, Case Code (Metric)=3216, Case/Package=Ceramic, Dielectric=X5R, LCSC Part Number=C318753, Manufacturer=Samsung, Max Operating Temperature=85°C, Min Operating Temperature=-55°C, Package Quantity=1, Tolerance=10%, Voltage Rating=50V, Category="Ceramic Capacitors", ComponentLink1Description=https://datasheet.ciiva.com/25727/cl31a475kb9lnnc-25727168.pdf?src-supplier=Digi-Key, ComponentLink1URL=https://datasheet.ciiva.com/25727/cl31a475kb9lnnc-25727168.pdf?src-supplier=Digi-Key, ComponentLink2Description=https://datasheet.ciiva.com/26838/getdatasheetpartid-359646-26838869.pdf?src-supplier=Verical, ComponentLink2URL=https://datasheet.ciiva.com/26838/getdatasheetpartid-359646-26838869.pdf?src-supplier=Verical, Depth=1.6mm, Item Type=Capacitor, Length=3.2mm, Manufacturer Part Number=CL31A475KB9LNNC, Mounting Technology="Surface Mount", Packaging="Tape and Reel", Pricing="4000=0.09189, 8000=0.08978, 16000=0.08767, 24000=0.08555, 32000=0.08344 (USD)", Radiation Hardening=No, RoHS=Yes, RoHS Compliant=Yes, Series=CL, Stock=176000, Supplier=Avnet, Supplier Part Number=CL31A475KB9LNNC, Thickness=0.039inch, Width=0.063inch
C4: library part CC0805KRX7R9BB101, "CAP CER 100PF 50V X7R 0805", LCSC Part Number=C107140, Manufacturer=Yageo, Supplier Part Number=3327608, Category="Ceramic Capacitors", ComponentLink1Description=https://datasheet.ciiva.com/11465/upy-gphc-x7r-6-3v-to-50v-8-11465306.pdf?src-supplier=Avnet, ComponentLink1URL=https://datasheet.ciiva.com/11465/upy-gphc-x7r-6-3v-to-50v-8-11465306.pdf?src-supplier=Avnet, Item Type=Capacitor, Manufacturer Part Number=CC0805KRX7R9BB101, Pricing="4000=0.0077, 16000=0.0073, 60000=0.007, 100000=0.0068, 200000=0.0065 (USD)", RoHS=Yes, Stock=516000, Supplier="Future Electronics"
C6: library part CC0603KRX7R9BB331, "CAP CER 330PF 50V X7R 0603", LCSC Part Number=C107087, Manufacturer=Yageo, Supplier Part Number=4215935, Category="Ceramic Capacitors", ComponentLink1Description=https://datasheet.ciiva.com/144/mlccorderingcode-144454.pdf?src-supplier=Digi-Key, ComponentLink1URL=https://datasheet.ciiva.com/144/mlccorderingcode-144454.pdf?src-supplier=Digi-Key, ComponentLink2Description=https://datasheet.ciiva.com/144/mlccorderingcode-144455.pdf?src-supplier=Digi-Key, ComponentLink2URL=https://datasheet.ciiva.com/144/mlccorderingcode-144455.pdf?src-supplier=Digi-Key, ComponentLink3Description=https://datasheet.ciiva.com/144/mlccorderingcode-144456.pdf?src-supplier=Digi-Key, ComponentLink3URL=https://datasheet.ciiva.com/144/mlccorderingcode-144456.pdf?src-supplier=Digi-Key, ComponentLink4Description=https://datasheet.ciiva.com/11465/upy-gphc-x7r-6-3v-to-50v-8-11465240.pdf?src-supplier=Avnet, ComponentLink4URL=https://datasheet.ciiva.com/11465/upy-gphc-x7r-6-3v-to-50v-8-11465240.pdf?src-supplier=Avnet, ComponentLink5Description=https://datasheet.ciiva.com/8033/1489800-8033879.pdf?src-supplier=Element14, ComponentLink5URL=https://datasheet.ciiva.com/8033/1489800-8033879.pdf?src-supplier=Element14, ComponentLink6Description=https://datasheet.ciiva.com/8033/1489800-8033881.pdf?src-supplier=Element14, ComponentLink6URL=https://datasheet.ciiva.com/8033/1489800-8033881.pdf?src-supplier=Element14, ComponentLink7Description=https://datasheet.ciiva.com/7978/1489800-7978174.pdf?src-supplier=Element14, ComponentLink7URL=https://datasheet.ciiva.com/7978/1489800-7978174.pdf?src-supplier=Element14, Item Type=Capacitor, Manufacturer Part Number=CC0603KRX7R9BB331, Pricing="4000=0.0051, 16000=0.0048, 60000=0.0045, 160000=0.0044, 400000=0.0041 (USD)", RoHS=Yes, Stock=856000, Supplier="Future Electronics"
C7: library part CC0603KRX7R9BB223, "CAP CER 0.022UF 50V X7R 0603", Case Code (Imperial)=0603, Case Code (Metric)=1608, Dielectric=X7R, Dielectric Material=Ceramic, Insulation Resistance=100GR, LCSC Part Number=C106222, Manufacturer=Yageo, Max Operating Temperature=125°C, Min Operating Temperature=-55°C, Package Quantity=1, Supplier Part Number 1=311-1370-1-ND, Tolerance=10%, Voltage=50V, Capacitance=22nF, Case/Package=0603, Category="Ceramic Capacitors", ComponentLink1Description=https://datasheet.ciiva.com/8033/70765-8033869.pdf?src-supplier=Element14, ComponentLink1URL=https://datasheet.ciiva.com/8033/70765-8033869.pdf?src-supplier=Element14, ComponentLink2Description=https://datasheet.ciiva.com/28450/1489800-28450639.pdf?src-supplier=Element14, ComponentLink2URL=https://datasheet.ciiva.com/28450/1489800-28450639.pdf?src-supplier=Element14, ComponentLink3Description=https://datasheet.ciiva.com/8033/1489800-8033867.pdf?src-supplier=Element14, ComponentLink3URL=https://datasheet.ciiva.com/8033/1489800-8033867.pdf?src-supplier=Element14, ComponentLink4Description=https://datasheet.ciiva.com/8033/1489800-8033865.pdf?src-supplier=Element14, ComponentLink4URL=https://datasheet.ciiva.com/8033/1489800-8033865.pdf?src-supplier=Element14, ComponentLink5Description=https://datasheet.ciiva.com/156/mlccorderingcode-156178.pdf?src-supplier=Digi-Key, ComponentLink5URL=https://datasheet.ciiva.com/156/mlccorderingcode-156178.pdf?src-supplier=Digi-Key, ComponentLink6Description=https://datasheet.ciiva.com/156/mlccorderingcode-156177.pdf?src-supplier=Digi-Key, ComponentLink6URL=https://datasheet.ciiva.com/156/mlccorderingcode-156177.pdf?src-supplier=Digi-Key, ComponentLink7Description=https://datasheet.ciiva.com/156/mlccorderingcode-156179.pdf?src-supplier=Digi-Key, ComponentLink7URL=https://datasheet.ciiva.com/156/mlccorderingcode-156179.pdf?src-supplier=Digi-Key, ComponentLink8Description=https://datasheet.ciiva.com/11464/upy-gphc-x7r-6-3v-to-50v-8-11464741.pdf?src-supplier=Avnet, ComponentLink8URL=https://datasheet.ciiva.com/11464/upy-gphc-x7r-6-3v-to-50v-8-11464741.pdf?src-supplier=Avnet, Depth=0.8mm, Halogen Free="Halogen Free", Height=0.8mm, Item Type=Capacitor, Lead Free="Lead Free", Length=1.6mm, Manufacturer Part Number=CC0603KRX7R9BB223, Mount="Surface Mount", Number of Pins=2, Packaging="Tape and Reel", Pricing 1="1=0.10000, 10=0.05500, 50=0.03020, 100=0.02460, 500=0.01760, 1000=0.01383 (USD)", Radiation Hardening=No, REACH SVHC="No SVHC", Resistor Type=Ceramic, RoHS=Yes, RoHS Compliant=Yes, Series=CC, Stock 1=119735, Supplier 1=Digi-Key, Termination=SMD/SMT, Thickness=0.035inch, Voltage Rating=50V, Voltage Rating (DC)=50V, Width=0.031inch
C8: library part CC1206JKX7R9BB224, "CAP CER 0.22UF 50V X7R 1206", LCSC Part Number=C527274, Manufacturer=Yageo, Supplier Part Number=4639209, Category="Ceramic Capacitors", ComponentLink1Description=https://datasheet.ciiva.com/13210/upy-gp-np0-16v-to-50v-8-13210060.pdf?src-supplier=Mouser, ComponentLink1URL=https://datasheet.ciiva.com/13210/upy-gp-np0-16v-to-50v-8-13210060.pdf?src-supplier=Mouser, ComponentLink2Description=https://datasheet.ciiva.com/11466/upy-gphc-x7r-6-3v-to-50v-8-11466351.pdf?src-supplier=Avnet, ComponentLink2URL=https://datasheet.ciiva.com/11466/upy-gphc-x7r-6-3v-to-50v-8-11466351.pdf?src-supplier=Avnet, Item Type=Capacitor, Manufacturer Part Number=CC1206JKX7R9BB224, Pricing="3000=0.0381, 9000=0.0366, 15000=0.036, 30000=0.0351, 60000=0.0337 (USD)", RoHS=Yes, Stock=3000, Supplier="Future Electronics"
C9: library part SHW680UF10V6.3X11, "680uF 10V 50mΩ@300kHz ±20% 980mA@100kHz Plugin,D6.3xL11mm Aluminum Electrolytic Capacitors - Leaded ROHS", LCSC Part Number=C494547, Manufacturer=KNSCHA, Package=Plugin,D6.3xL11mm, ComponentLink1Description=LCSC, ComponentLink1URL=https://www.lcsc.com/product-detail/Aluminum-Electrolytic-Capacitors-Leaded_KNSCHA-SHW680UF10V6-3X11_C494547.html, Item Type="Electrolytic Capacitor", Manufacturer Part Number=SHW680UF10V6.3X11
C10: library part GRM188R61E106KA73D, "CAP CER 10UF 25V X5R 0603", Case/Package=0603, LCSC Part Number=C344022, Manufacturer=Murata, Supplier Part Number 1=81-GRM188R61E106KA3D, Category="Ceramic Capacitors", ComponentLink1Description=https://search.murata.co.jp/Ceramy/image/img/A01X/G101/ENG/GRM188R61E106KA73-01.pdf?src-supplier=Digi-Key, ComponentLink1URL=https://search.murata.co.jp/Ceramy/image/img/A01X/G101/ENG/GRM188R61E106KA73-01.pdf?src-supplier=Digi-Key, Manufacturer Part Number=GRM188R61E106KA73D, Pricing 1="1=0.36000, 10=0.25800, 50=0.25800, 100=0.15500, 1000=0.09800, 10000=0.06900 (USD)", RoHS=Yes, RoHS Compliant=Yes, Stock 1=319428, Supplier 1=Mouser
C11 C13 C16 C17 C19 C20 C22 C24 C27 C30 C32: library part GRM033R61E104KE14D, "CAP CER 0.1UF 25V X5R 0201", Case Code (Imperial)=0201, Case Code (Metric)=0603, Dielectric=X5R, LCSC Part Number=C76939, Manufacturer=Murata, Max Operating Temperature=85°C, Min Operating Temperature=-55°C, Package Quantity=15000, Supplier Part Number=1852066, Tolerance=10%, Voltage Rating=25V, Case/Package=0201, Category="Ceramic Capacitors", ComponentLink1Description=http://www.farnell.com/datasheets/2867843.pdf?src-supplier=Farnell, ComponentLink1URL=http://www.farnell.com/datasheets/2867843.pdf?src-supplier=Farnell, ComponentLink2Description=http://www.mouser.com/ds/2/281/c02e-2905.pdf?src-supplier=Mouser, ComponentLink2URL=http://www.mouser.com/ds/2/281/c02e-2905.pdf?src-supplier=Mouser, ComponentLink3Description=https://datasheet.octopart.com/GRM033R61E104KE14D-Murata-datasheet-22122223.pdf?src-supplier=Future+Electronics, ComponentLink3URL=https://datasheet.octopart.com/GRM033R61E104KE14D-Murata-datasheet-22122223.pdf?src-supplier=Future+Electronics, ComponentLink4Description=http://www.farnell.com/datasheets/2867843.pdf?src-supplier=Element14, ComponentLink4URL=http://www.farnell.com/datasheets/2867843.pdf?src-supplier=Element14, ComponentLink5Description=http://search.murata.co.jp/Ceramy/image/img/A01X/G101/ENG/GRM033R61E104KE14-01.pdf?src-supplier=Digi-Key, ComponentLink5URL=http://search.murata.co.jp/Ceramy/image/img/A01X/G101/ENG/GRM033R61E104KE14-01.pdf?src-supplier=Digi-Key, ComponentLink6Description=http://www.farnell.com/datasheets/2867843.pdf?src-supplier=Newark, ComponentLink6URL=http://www.farnell.com/datasheets/2867843.pdf?src-supplier=Newark, ComponentLink7Description=https://datasheet.octopart.com/GRM033R61E104KE14D-Murata-datasheet-165579666.pdf?src-supplier=TME, ComponentLink7URL=https://datasheet.octopart.com/GRM033R61E104KE14D-Murata-datasheet-165579666.pdf?src-supplier=TME, Height=0.3mm, Item Type=Capacitor, Lead Free="Lead Free", Length=0.024inch, Manufacturer Part Number=GRM033R61E104KE14D, Material=4241ConductorMaterial, Mounting Technology="Surface Mount", Packaging="Tape and Reel", Pricing="1000=0.008, 5000=0.007, 10000=0.006 (GBP)", RoHS=Yes, RoHS Compliant=Yes, Series=GRM, Stock=14000, Supplier=Rs, Termination=SMD/SMT, Thickness=0.013inch, Voltage Rating (DC)=25V, Weight=1.2E-05oz, Width=0.012inch
C12 C14: library part CL05A106MP5NUNC, "CAP CER 10UF 10V X5R 0402", Case Code (Imperial)=0402, Case Code (Metric)=1005, Dielectric=X5R, LCSC Part Number=C315248, Manufacturer=Samsung, Max Operating Temperature=85°C, Min Operating Temperature=-55°C, Package Quantity=1, Tolerance=20%, Voltage Rating=10V, Capacitance=10uF, Case/Package=0402, Category="Ceramic Capacitors", ComponentLink1Description=https://datasheet.ciiva.com/25721/cl05a106mp5nunc-25721584.pdf?src-supplier=Digi-Key, ComponentLink1URL=https://datasheet.ciiva.com/25721/cl05a106mp5nunc-25721584.pdf?src-supplier=Digi-Key, ComponentLink2Description=https://datasheet.ciiva.com/26838/getdatasheetpartid-745310-26838170.pdf?src-supplier=Verical, ComponentLink2URL=https://datasheet.ciiva.com/26838/getdatasheetpartid-745310-26838170.pdf?src-supplier=Verical, Construction=Flat, Contact Plating=Tin, Depth=0.5mm, Item Type=Capacitor, Lead Free="Lead Free", Length=1mm, Manufacturer Part Number=CL05A106MP5NUNC, Mount="Surface Mount", Packaging="Tape and Reel", Pricing 1="10000=0.02537 (USD)", Radiation Hardening=No, RoHS=Yes, RoHS Compliant=Yes, Series=CL, Stock 1=1729850, Supplier 1=Avnet, Supplier Part Number 1=CL05A106MP5NUNC, Termination=Wraparound, Thickness=0.028inch, Width=0.02inch
C15 C18 C21 C33: library part GRM033R61C105ME15D, "CAP CER 1UF 16V X5R 0201", LCSC Part Number=C335102, Manufacturer=Murata, Supplier Part Number 1=490-18654-1-ND, Category="Ceramic Capacitors", ComponentLink1Description=https://datasheet.octopart.com/GRM033R61C105ME15D-Murata-datasheet-155345049.pdf?src-supplier=Element14, ComponentLink1URL=https://datasheet.octopart.com/GRM033R61C105ME15D-Murata-datasheet-155345049.pdf?src-supplier=Element14, ComponentLink2Description=https://datasheet.octopart.com/GRM033R61C105ME15D-Murata-datasheet-165579666.pdf?src-supplier=TME, ComponentLink2URL=https://datasheet.octopart.com/GRM033R61C105ME15D-Murata-datasheet-165579666.pdf?src-supplier=TME, Item Type=Capacitor, Manufacturer Part Number=GRM033R61C105ME15D, Pricing 1="1=0.14, 10=0.098, 50=0.0554, 100=0.0459, 500=0.0322, 1000=0.02665, 2500=0.02481, 5000=0.0227 (USD)", RoHS=No, Stock 1=12823, Supplier 1=Digi-Key
C25 C26: library part GRM0335C1H220JA01D, "CAP CER 22PF 50V C0G/NP0 0201", Case Code (Imperial)=0201, Case Code (Metric)=0603, Dielectric=C0G, LCSC Part Number=C76924, Manufacturer=Murata, Max Operating Temperature=125°C, Min Operating Temperature=-55°C, Package Quantity=1, Supplier Part Number=8202728, Temperature Coefficient=30ppm/°C, Tolerance=5%, Voltage=50V, Case/Package=0201, Category="Ceramic Capacitors", ComponentLink1Description=https://datasheet.ciiva.com/6271/partnumbering-e-01-6271146.pdf?src-supplier=Digi-Key, ComponentLink1URL=https://datasheet.ciiva.com/6271/partnumbering-e-01-6271146.pdf?src-supplier=Digi-Key, ComponentLink2Description=https://datasheet.ciiva.com/6271/partnumbering-e-01-6271143.pdf?src-supplier=Digi-Key, ComponentLink2URL=https://datasheet.ciiva.com/6271/partnumbering-e-01-6271143.pdf?src-supplier=Digi-Key, ComponentLink3Description=https://datasheet.ciiva.com/6271/partnumbering-e-01-6271149.pdf?src-supplier=Digi-Key, ComponentLink3URL=https://datasheet.ciiva.com/6271/partnumbering-e-01-6271149.pdf?src-supplier=Digi-Key, Depth=0.3mm, Height=0.3mm, Item Type=Capacitor, Lead Free="Lead Free", Length=0.024inch, Manufacturer Part Number=GRM0335C1H220JA01D, Material=4241ConductorMaterial, Mounting Technology="Surface Mount", Packaging="Tape and Reel", Pricing="500=0.004, 5000=0.003, 12500=0.002, 50000=0.002 (GBP)", RoHS=Yes, RoHS Compliant=Yes, Series=GRM, Stock=9500, Supplier=Rs, Termination=SMD/SMT, Voltage Rating=50V, Voltage Rating (DC)=50V, Width=0.012inch
C28: library part CC0201CRNPO9BN2R7, "CAP CER 2.7PF 50V C0G/NPO 0201", Case Code (Imperial)=0201, Case Code (Metric)=0603, Dielectric=C0G, LCSC Part Number=C325439, Manufacturer=Yageo, Max Operating Temperature=125°C, Min Operating Temperature=-55°C, Voltage Rating=50V, Case/Package=0201, Category="Ceramic Capacitors", ComponentLink1Description=https://datasheet.ciiva.com/13208/upy-gp-np0-16v-to-50v-8-13208314.pdf?src-supplier=Mouser, ComponentLink1URL=https://datasheet.ciiva.com/13208/upy-gp-np0-16v-to-50v-8-13208314.pdf?src-supplier=Mouser, Item Type=Capacitor, Length=0.024inch, Manufacturer Part Number=CC0201CRNPO9BN2R7, Mounting Technology="Surface Mount", Packaging="Tape and Reel", Pricing="15000=0.0017 (USD)", RoHS=Yes, RoHS Compliant=Yes, Series=CC, Stock=15000, Supplier=Avnet, Supplier Part Number=CC0201CRNPO9BN2R7, Termination=SMD/SMT, Thickness=0.013inch, Voltage Rating (DC)=50V, Weight=6E-06oz, Width=0.012inch
C29: library part CC0201BRNPO9BN4R7, "CAP CER 4.7PF 50V C0G/NPO 0201", Case/Package=0201, LCSC Part Number=C505471, Manufacturer=Yageo, Max Operating Temperature=125°C, Min Operating Temperature=-55°C, Voltage Rating=50V, Category="Ceramic Capacitors", ComponentLink1Description=https://www.yageo.com/upload/media/product/productsearch/datasheet/mlcc/UPY-GP_NP0_16V-to-50V_18.pdf?src-supplier=Digi-Key, ComponentLink1URL=https://www.yageo.com/upload/media/product/productsearch/datasheet/mlcc/UPY-GP_NP0_16V-to-50V_18.pdf?src-supplier=Digi-Key, ComponentLink2Description=http://www.yageo.com/documents/recent/UPY-GP_NP0_16V-to-50V_16.pdf?src-supplier=Digi-Key, ComponentLink2URL=http://www.yageo.com/documents/recent/UPY-GP_NP0_16V-to-50V_16.pdf?src-supplier=Digi-Key, Item Type=Capacitor, Length=0.024inch, Manufacturer Part Number=CC0201BRNPO9BN4R7, Mounting Technology="Surface Mount", Packaging="Tape and Reel", Pricing="15000=0.0023 (USD)", RoHS=Yes, RoHS Compliant=Yes, Series=CC, Stock=210000, Supplier="Arrow Electronics", Supplier Part Number=CC0201BRNPO9BN4R7, Thickness=0.013inch, Width=0.012inch
C31: library part TAJB336K010RNJ, "CAP TANT 33UF 10% 10V 1411", Case Code (Imperial)=1210, Case Code (Metric)=3528, Dielectric Material=Tantalum, ESR (Equivalent Series Resistance)=1.8R, LCSC Part Number=C7202, Leakage Current=3.3uA, Manufacturer="Kyocera AVX", Max Operating Temperature=125°C, Min Operating Temperature=-55°C, Package Quantity=1, Supplier Part Number 1=1364604P, Tolerance=10%, Voltage=10V, Case/Package=1210, Category="Tantalum Capacitors", ComponentLink1Description=https://datasheet.ciiva.com/26341/559435-da-01-en-tacc-b-3-2-mm-x-2-5-mm-x-1-9-mm-33-uf-26341776.pdf?src-supplier=Conrad, ComponentLink1URL=https://datasheet.ciiva.com/26341/559435-da-01-en-tacc-b-3-2-mm-x-2-5-mm-x-1-9-mm-33-uf-26341776.pdf?src-supplier=Conrad, ComponentLink2Description=https://datasheet.ciiva.com/7775/49917-7775706.pdf?src-supplier=Element14, ComponentLink2URL=https://datasheet.ciiva.com/7775/49917-7775706.pdf?src-supplier=Element14, ComponentLink3Description=https://datasheet.ciiva.com/7775/49917-7775705.pdf?src-supplier=Element14, ComponentLink3URL=https://datasheet.ciiva.com/7775/49917-7775705.pdf?src-supplier=Element14, ComponentLink4Description=https://datasheet.ciiva.com/7775/1680476-7775704.pdf?src-supplier=Element14, ComponentLink4URL=https://datasheet.ciiva.com/7775/1680476-7775704.pdf?src-supplier=Element14, ComponentLink5Description=https://datasheet.ciiva.com/264/taj-264134.pdf?src-supplier=Digi-Key, ComponentLink5URL=https://datasheet.ciiva.com/264/taj-264134.pdf?src-supplier=Digi-Key, ComponentLink6Description=https://datasheet.ciiva.com/264/taj-264133.pdf?src-supplier=Digi-Key, ComponentLink6URL=https://datasheet.ciiva.com/264/taj-264133.pdf?src-supplier=Digi-Key, ComponentLink7Description=https://datasheet.ciiva.com/264/taj-264135.pdf?src-supplier=Digi-Key, ComponentLink7URL=https://datasheet.ciiva.com/264/taj-264135.pdf?src-supplier=Digi-Key, ComponentLink8Description=https://datasheet.ciiva.com/12884/taj-27497-12884279.pdf?src-supplier=Mouser, ComponentLink8URL=https://datasheet.ciiva.com/12884/taj-27497-12884279.pdf?src-supplier=Mouser, ComponentLink9Description=https://datasheet.ciiva.com/14590/70001050-14590215.pdf?src-supplier=Allied+Electronics, ComponentLink9URL=https://datasheet.ciiva.com/14590/70001050-14590215.pdf?src-supplier=Allied+Electronics, ComponentLink10Description=https://datasheet.ciiva.com/14592/70001050-14592670.pdf?src-supplier=Allied+Electronics, ComponentLink10URL=https://datasheet.ciiva.com/14592/70001050-14592670.pdf?src-supplier=Allied+Electronics, ComponentLink11Description=https://datasheet.ciiva.com/11224/taj-11224937.pdf?src-supplier=Avnet, ComponentLink11URL=https://datasheet.ciiva.com/11224/taj-11224937.pdf?src-supplier=Avnet, ComponentLink12Description=https://datasheet.ciiva.com/16492/taj-16492863.pdf?src-supplier=Future+Electronics, ComponentLink12URL=https://datasheet.ciiva.com/16492/taj-16492863.pdf?src-supplier=Future+Electronics, ComponentLink13Description=https://datasheet.ciiva.com/11224/taj-11224941.pdf?src-supplier=Avnet, ComponentLink13URL=https://datasheet.ciiva.com/11224/taj-11224941.pdf?src-supplier=Avnet, Construction=Flat, Depth=2.8mm, Dissipation Factor=6%, Features="General Purpose", Height=1.9mm, Height - Seated (Max)=0.083inch, Item Type=Capacitor, Lead Free="Lead Free", Lead Pitch=1.4mm, Length=3.5mm, Manufacturer Part Number=TAJB336K010RNJ, Mounting Technology="Surface Mount,PCB", Packaging="Tape and Reel", Pins=2, Polarity=Polar, Pricing 1="100=0.01410, 400=0.24800, 1000=0.21600 (GBP)", Radiation Hardening=No, Reach SVHC Compliant=Yes, RoHS=Yes, RoHS Compliant=Yes, Series=TAJ, Stock 1=1580, Supplier 1=Rs, Termination=SMD/SMT, Voltage Rating=10V, Voltage Rating (DC)=10V, Width=2.8mm
D1 D2: "DIODE GEN PURP 1KV 1A SMA", Average Rectified Current=1A, Case/Package=SMA, Forward Voltage=1.18V, LCSC Part Number=C47921, Manufacturer="ON Semiconductor", Max Forward Surge Current (Ifsm)=30A, Max Operating Temperature=175°C, Max Repetitive Reverse Voltage (Vrrm)=1kV, Max Reverse Current=10uA, Min Operating Temperature=-55°C, Package Quantity=1, Category="Rectifier Diodes", ComponentLink1Description=https://datasheet.ciiva.com/34303/2013551-34303843.pdf?src-supplier=Jameco, ComponentLink1URL=https://datasheet.ciiva.com/34303/2013551-34303843.pdf?src-supplier=Jameco, ComponentLink2Description=https://datasheet.ciiva.com/30479/0900766b8078eb75-30479272.pdf?src-supplier=Rs, ComponentLink2URL=https://datasheet.ciiva.com/30479/0900766b8078eb75-30479272.pdf?src-supplier=Rs, ComponentLink3Description=https://datasheet.ciiva.com/7962/mra4003t3-d-7962843.pdf?src-supplier=Element14, ComponentLink3URL=https://datasheet.ciiva.com/7962/mra4003t3-d-7962843.pdf?src-supplier=Element14, ComponentLink4Description=https://datasheet.ciiva.com/7962/mra4003t3-d-7962842.pdf?src-supplier=Element14, ComponentLink4URL=https://datasheet.ciiva.com/7962/mra4003t3-d-7962842.pdf?src-supplier=Element14, ComponentLink5Description=https://datasheet.ciiva.com/22749/1747991-22749573.pdf?src-supplier=Element14, ComponentLink5URL=https://datasheet.ciiva.com/22749/1747991-22749573.pdf?src-supplier=Element14, ComponentLink6Description=https://datasheet.ciiva.com/14558/70099554-14558476.pdf?src-supplier=Allied+Electronics, ComponentLink6URL=https://datasheet.ciiva.com/14558/70099554-14558476.pdf?src-supplier=Allied+Electronics, ComponentLink7Description=https://datasheet.ciiva.com/8299/mra4003t3-d-8299900.pdf?src-supplier=Avnet, ComponentLink7URL=https://datasheet.ciiva.com/8299/mra4003t3-d-8299900.pdf?src-supplier=Avnet, Current Rating=1A, Forward Current=1A, Height=2mm, Item Type=Diode, Lead Free="Lead Free", Length=4.32mm, Manufacturer Part Number=MRA4007T3G, Max Reverse Voltage (DC)=1kV, Max Surge Current=30A, Output Current=1A, Packaging="Tape and Reel", Peak Non-Repetitive Surge Current=30A, Pins=2, Polarity=Standard, Pricing="20000=0.0492, 25000=0.0487, 50000=0.0483, 100000=0.0476 (USD)", Radiation Hardening=No, Reach SVHC Compliant=No, Reverse Voltage=1kV, RoHS=Yes, RoHS Compliant=Yes, Series=-, Stock=240000, Supplier="Arrow Electronics", Supplier Part Number=MRA4007T3G, Voltage Rating (DC)=1kV, Width=2.6mm
D3: "DIODE SCHOTTKY 100V 150MA SOD123", Average Rectified Current=150mA, Current Rating=160mA, Forward Voltage=1V, LCSC Part Number=C283255, Manufacturer=STMicroelectronics, Max Forward Surge Current (Ifsm)=1A, Max Operating Temperature=150°C, Max Repetitive Reverse Voltage (Vrrm)=100V, Max Reverse Current=5uA, Min Operating Temperature=-65°C, Package Quantity=3000, Supplier Part Number=511-BAT46ZFILM, Category="Rectifier Diodes", ComponentLink1Description=https://datasheet.ciiva.com/23920/cd00004930-23920128.pdf?src-supplier=Newark, ComponentLink1URL=https://datasheet.ciiva.com/23920/cd00004930-23920128.pdf?src-supplier=Newark, ComponentLink2Description=https://datasheet.ciiva.com/14168/cd00004930-14168058.pdf?src-supplier=Distrelec, ComponentLink2URL=https://datasheet.ciiva.com/14168/cd00004930-14168058.pdf?src-supplier=Distrelec, ComponentLink3Description=https://datasheet.ciiva.com/4714/cd00004930-111868-4714530.pdf?src-supplier=Mouser, ComponentLink3URL=https://datasheet.ciiva.com/4714/cd00004930-111868-4714530.pdf?src-supplier=Mouser, ComponentLink4Description=https://datasheet.ciiva.com/17097/bat46zfilm-17097700.pdf?src-supplier=Allied+Electronics, ComponentLink4URL=https://datasheet.ciiva.com/17097/bat46zfilm-17097700.pdf?src-supplier=Allied+Electronics, ComponentLink5Description=https://datasheet.ciiva.com/22733/1761349-22733179.pdf?src-supplier=Element14, ComponentLink5URL=https://datasheet.ciiva.com/22733/1761349-22733179.pdf?src-supplier=Element14, ComponentLink6Description=https://datasheet.ciiva.com/915/cd00004930-915572.pdf?src-supplier=Digi-Key, ComponentLink6URL=https://datasheet.ciiva.com/915/cd00004930-915572.pdf?src-supplier=Digi-Key, ComponentLink7Description=https://datasheet.ciiva.com/915/cd00004930-915571.pdf?src-supplier=Digi-Key, ComponentLink7URL=https://datasheet.ciiva.com/915/cd00004930-915571.pdf?src-supplier=Digi-Key, ComponentLink8Description=https://datasheet.ciiva.com/915/cd00004930-915573.pdf?src-supplier=Digi-Key, ComponentLink8URL=https://datasheet.ciiva.com/915/cd00004930-915573.pdf?src-supplier=Digi-Key, ComponentLink9Description=https://datasheet.ciiva.com/16221/cd00004930-16221159.pdf?src-supplier=Future+Electronics, ComponentLink9URL=https://datasheet.ciiva.com/16221/cd00004930-16221159.pdf?src-supplier=Future+Electronics, ComponentLink10Description=https://datasheet.ciiva.com/15144/getdatasheetpartid-89559-15144645.pdf?src-supplier=Verical, ComponentLink10URL=https://datasheet.ciiva.com/15144/getdatasheetpartid-89559-15144645.pdf?src-supplier=Verical, Forward Current=150mA, Height=1.35mm, Item Type="Schottky Diode", Lead Free="Lead Free", Length=2.85mm, Manufacturer Part Number=BAT46ZFILM, Max Reverse Leakage Current=5uA, Max Reverse Voltage (DC)=100V, Max Surge Current=1A, Mounting Technology="Surface Mount", Output Current=150mA, Packaging="Tape and Reel", Peak Non-Repetitive Surge Current=1A, Pins=2, Polarity=Standard, Pricing="1=0.44, 10=0.307, 50=0.307, 100=0.124, 1000=0.093, 10000=0.064 (USD)", Radiation Hardening=No, Reach SVHC Compliant=No, RoHS=Yes, RoHS Compliant=Yes, Series=-, Stock=123459, Supplier=Mouser, Voltage Rating (DC)=100V, Width=1.7mm
D4 D5: "Diode Standard 600V 1A Surface Mount SMA", Average Rectified Current=1A, Case/Package=SMA, Forward Voltage=1.3V, LCSC Part Number=C98801, Manufacturer=STMicroelectronics, Max Forward Surge Current (Ifsm)=10A, Max Operating Temperature=175°C, Max Repetitive Reverse Voltage (Vrrm)=600V, Max Reverse Current=1uA, Max Surge Current=20A, Min Operating Temperature=-65°C, Package Quantity=1, Supplier Part Number=511-STTH1L06A, Category="Rectifier Diodes", ComponentLink1Description=https://datasheet.ciiva.com/915/cd00002694-915859.pdf?src-supplier=Digi-Key, ComponentLink1URL=https://datasheet.ciiva.com/915/cd00002694-915859.pdf?src-supplier=Digi-Key, ComponentLink2Description=https://datasheet.ciiva.com/915/cd00002694-915858.pdf?src-supplier=Digi-Key, ComponentLink2URL=https://datasheet.ciiva.com/915/cd00002694-915858.pdf?src-supplier=Digi-Key, ComponentLink3Description=https://datasheet.ciiva.com/915/cd00002694-915860.pdf?src-supplier=Digi-Key, ComponentLink3URL=https://datasheet.ciiva.com/915/cd00002694-915860.pdf?src-supplier=Digi-Key, ComponentLink4Description=https://datasheet.ciiva.com/7964/1671053-7964013.pdf?src-supplier=Element14, ComponentLink4URL=https://datasheet.ciiva.com/7964/1671053-7964013.pdf?src-supplier=Element14, ComponentLink5Description=https://datasheet.ciiva.com/7964/1671053-7964014.pdf?src-supplier=Element14, ComponentLink5URL=https://datasheet.ciiva.com/7964/1671053-7964014.pdf?src-supplier=Element14, ComponentLink6Description=https://datasheet.ciiva.com/26818/getdatasheetpartid-65243-26818021.pdf?src-supplier=Verical, ComponentLink6URL=https://datasheet.ciiva.com/26818/getdatasheetpartid-65243-26818021.pdf?src-supplier=Verical, Current Rating=1A, Forward Current=1A, Height=2.03mm, Item Type=Diode, Lead Free="Lead Free", Length=4.6mm, Manufacturer Part Number=STTH1L06A, Max Reverse Voltage (DC)=600V, Mounting Technology="Surface Mount", Output Current=1A, Packaging="Tape and Reel", Peak Non-Repetitive Surge Current=20A, Pins=2, Polarity=Standard, Pricing="1=0.44, 10=0.377, 50=0.377, 100=0.283, 1000=0.163, 10000=0.138 (USD)", Radiation Hardening=No, Reach SVHC Compliant=No, Recovery Time=80ns, Reverse Recovery Time=80ns, Reverse Recovery Time-Max=80ns, Reverse Voltage=600V, RoHS=Yes, RoHS Compliant=Yes, Series=-, Stock=400, Supplier=Mouser, Voltage Rating (DC)=600V, Width=2.95mm
D6: "DIODE GEN PURP 75V 200MA SOD523F", Average Rectified Current=200mA, Forward Current=300mA, LCSC Part Number=C232841, Manufacturer="ON Semiconductor / Fairchild", Max Forward Surge Current (Ifsm)=4A, Max Operating Temperature=150°C, Max Repetitive Reverse Voltage (Vrrm)=75V, Max Reverse Current=5uA, Min Operating Temperature=-55°C, Package Quantity=1, Power Dissipation=200mW, Supplier Part Number 1=6145918, Category="Rectifier Diodes", ComponentLink1Description=https://datasheet.ciiva.com/16744/1n4148wt-16744972.pdf?src-supplier=Future+Electronics, ComponentLink1URL=https://datasheet.ciiva.com/16744/1n4148wt-16744972.pdf?src-supplier=Future+Electronics, ComponentLink2Description=https://datasheet.ciiva.com/30479/0900766b810e1cd4-30479226.pdf?src-supplier=Rs, ComponentLink2URL=https://datasheet.ciiva.com/30479/0900766b810e1cd4-30479226.pdf?src-supplier=Rs, ComponentLink3Description=https://datasheet.ciiva.com/15208/getdatasheetpartid-146392-15208359.pdf?src-supplier=Verical, ComponentLink3URL=https://datasheet.ciiva.com/15208/getdatasheetpartid-146392-15208359.pdf?src-supplier=Verical, ComponentLink4Description=https://datasheet.ciiva.com/916/1n914bwt-916865.pdf?src-supplier=Digi-Key, ComponentLink4URL=https://datasheet.ciiva.com/916/1n914bwt-916865.pdf?src-supplier=Digi-Key, ComponentLink5Description=https://datasheet.ciiva.com/916/1n914bwt-916866.pdf?src-supplier=Digi-Key, ComponentLink5URL=https://datasheet.ciiva.com/916/1n914bwt-916866.pdf?src-supplier=Digi-Key, ComponentLink6Description=https://datasheet.ciiva.com/916/1n914bwt-916864.pdf?src-supplier=Digi-Key, ComponentLink6URL=https://datasheet.ciiva.com/916/1n914bwt-916864.pdf?src-supplier=Digi-Key, Contact Plating=Tin,Matte, Element Configuration=Single, Height=0.7mm, Item Type=Diode, Lead Free="Lead Free", Length=1.3mm, Manufacturer Part Number=1N4148WT, Max Reverse Voltage (DC)=75V, Mounting Technology="Surface Mount", Packaging="Tape and Reel", Pins=2, Pricing 1="1=0.0305, 20=0.0267, 125=0.0246, 750=0.0227, 4000=0.0204 (USD)", Radiation Hardening=No, Reach SVHC Compliant=No, Recovery Time=4ns, Reverse Recovery Time=4ns, Reverse Recovery Time-Max=4ns, RoHS=Yes, RoHS Compliant=Yes, Series=-, Stock 1=30, Supplier 1="Future Electronics", Weight=0.01g, Width=0.9mm
J1: "1x5P -40℃~+105℃ 15A 250V Green 14~26 Straight pin 5mm 1.5 1 5 Plugin,P=5mm Screw terminal ROHS", LCSC Part Number=C192780, Manufacturer="Ningbo Kangnex Elec", Package=Plugin,P=5mm, ComponentLink1Description=LCSC, ComponentLink1URL=https://www.lcsc.com/product-detail/Screw-terminal_Ningbo-Kangnex-Elec-WJ127-5-0-5P_C192780.html, Item Type="Screw terminal", Manufacturer Part Number=WJ127-5.0-5P
J2: library part C145963, "1x6P SH 1 1mm 6 SMD,P=1mm Wire To Board / Wire To Wire Connector ROHS", Manufacturer=BOOMELE, Package=SMD,P=1mm, ComponentLink1Description=LCSC, ComponentLink1URL=https://www.lcsc.com/product-detail/Wire-To-Board-Wire-To-Wire-Connector_BOOMELE-Boom-Precision-Elec-C145963_C145963.html, Item Type=Connector, LCSC Part Number=C145963, Manufacturer Part Number=C145963
K1: "AgSnO2 5V 10A 10A@250VAC Normal Open:1A(SPST-Normal Open) 4 Plugin,10.1x17.6mm Power Relays ROHS", LCSC Part Number=C91370, Manufacturer=HF, Package=Plugin,10.1x17.6mm, ComponentLink1Description=LCSC, ComponentLink1URL=https://www.lcsc.com/product-detail/Power-Relays_HF-Xiamen-Hongfa-Electroacoustic-HF32FA-G-005-HSL1_C91370.html, Item Type=Relay, Manufacturer Part Number=HF32FA-G/005-HSL1
L1: library part SPK0608-102MB, "200mA 1mH ±20% Plugin,D7xL11mm Color Ring Inductors/Through Hole Inductors ROHS", LCSC Part Number=C5127530, Manufacturer="LanTu Micro", Package=Plugin,D7xL11mm, ComponentLink1Description=LCSC, ComponentLink1URL=https://www.lcsc.com/product-detail/Color-Ring-Inductors-Through-Hole-Inductors_LanTu-Micro-SPK0608-102MB_C5127530.html, Item Type="Through Hole Inductor", Manufacturer Part Number=SPK0608-102MB
L2: library part YNR6045-221M, "590mA 220uH ±20% SMD,6x6mm Power Inductors ROHS", LCSC Part Number=C497842, Manufacturer=YJYCOIN, Package=SMD,6x6mm, ComponentLink1Description=LCSC, ComponentLink1URL=https://www.lcsc.com/product-detail/Power-Inductors_YJYCOIN-YNR6045-221M_C497842.html, Item Type=Inductor, Manufacturer Part Number=YNR6045-221M